# Altium PCB OFP_CIM_v1.5.PcbDoc (part 1 of 3)
Units mil, origin at the board's own origin, x right, y up, seen from the top; angles counter-clockwise.
Board outline 4311.02 x 2539.37 mil, 4 copper layers (Top Layer, Layer 1, Layer 2, Bottom Layer), stack 62.047 mil thick; 193 components, 140 nets, 567 pads, 380 vias.
Unrouted connection lines stored in the file: 1.
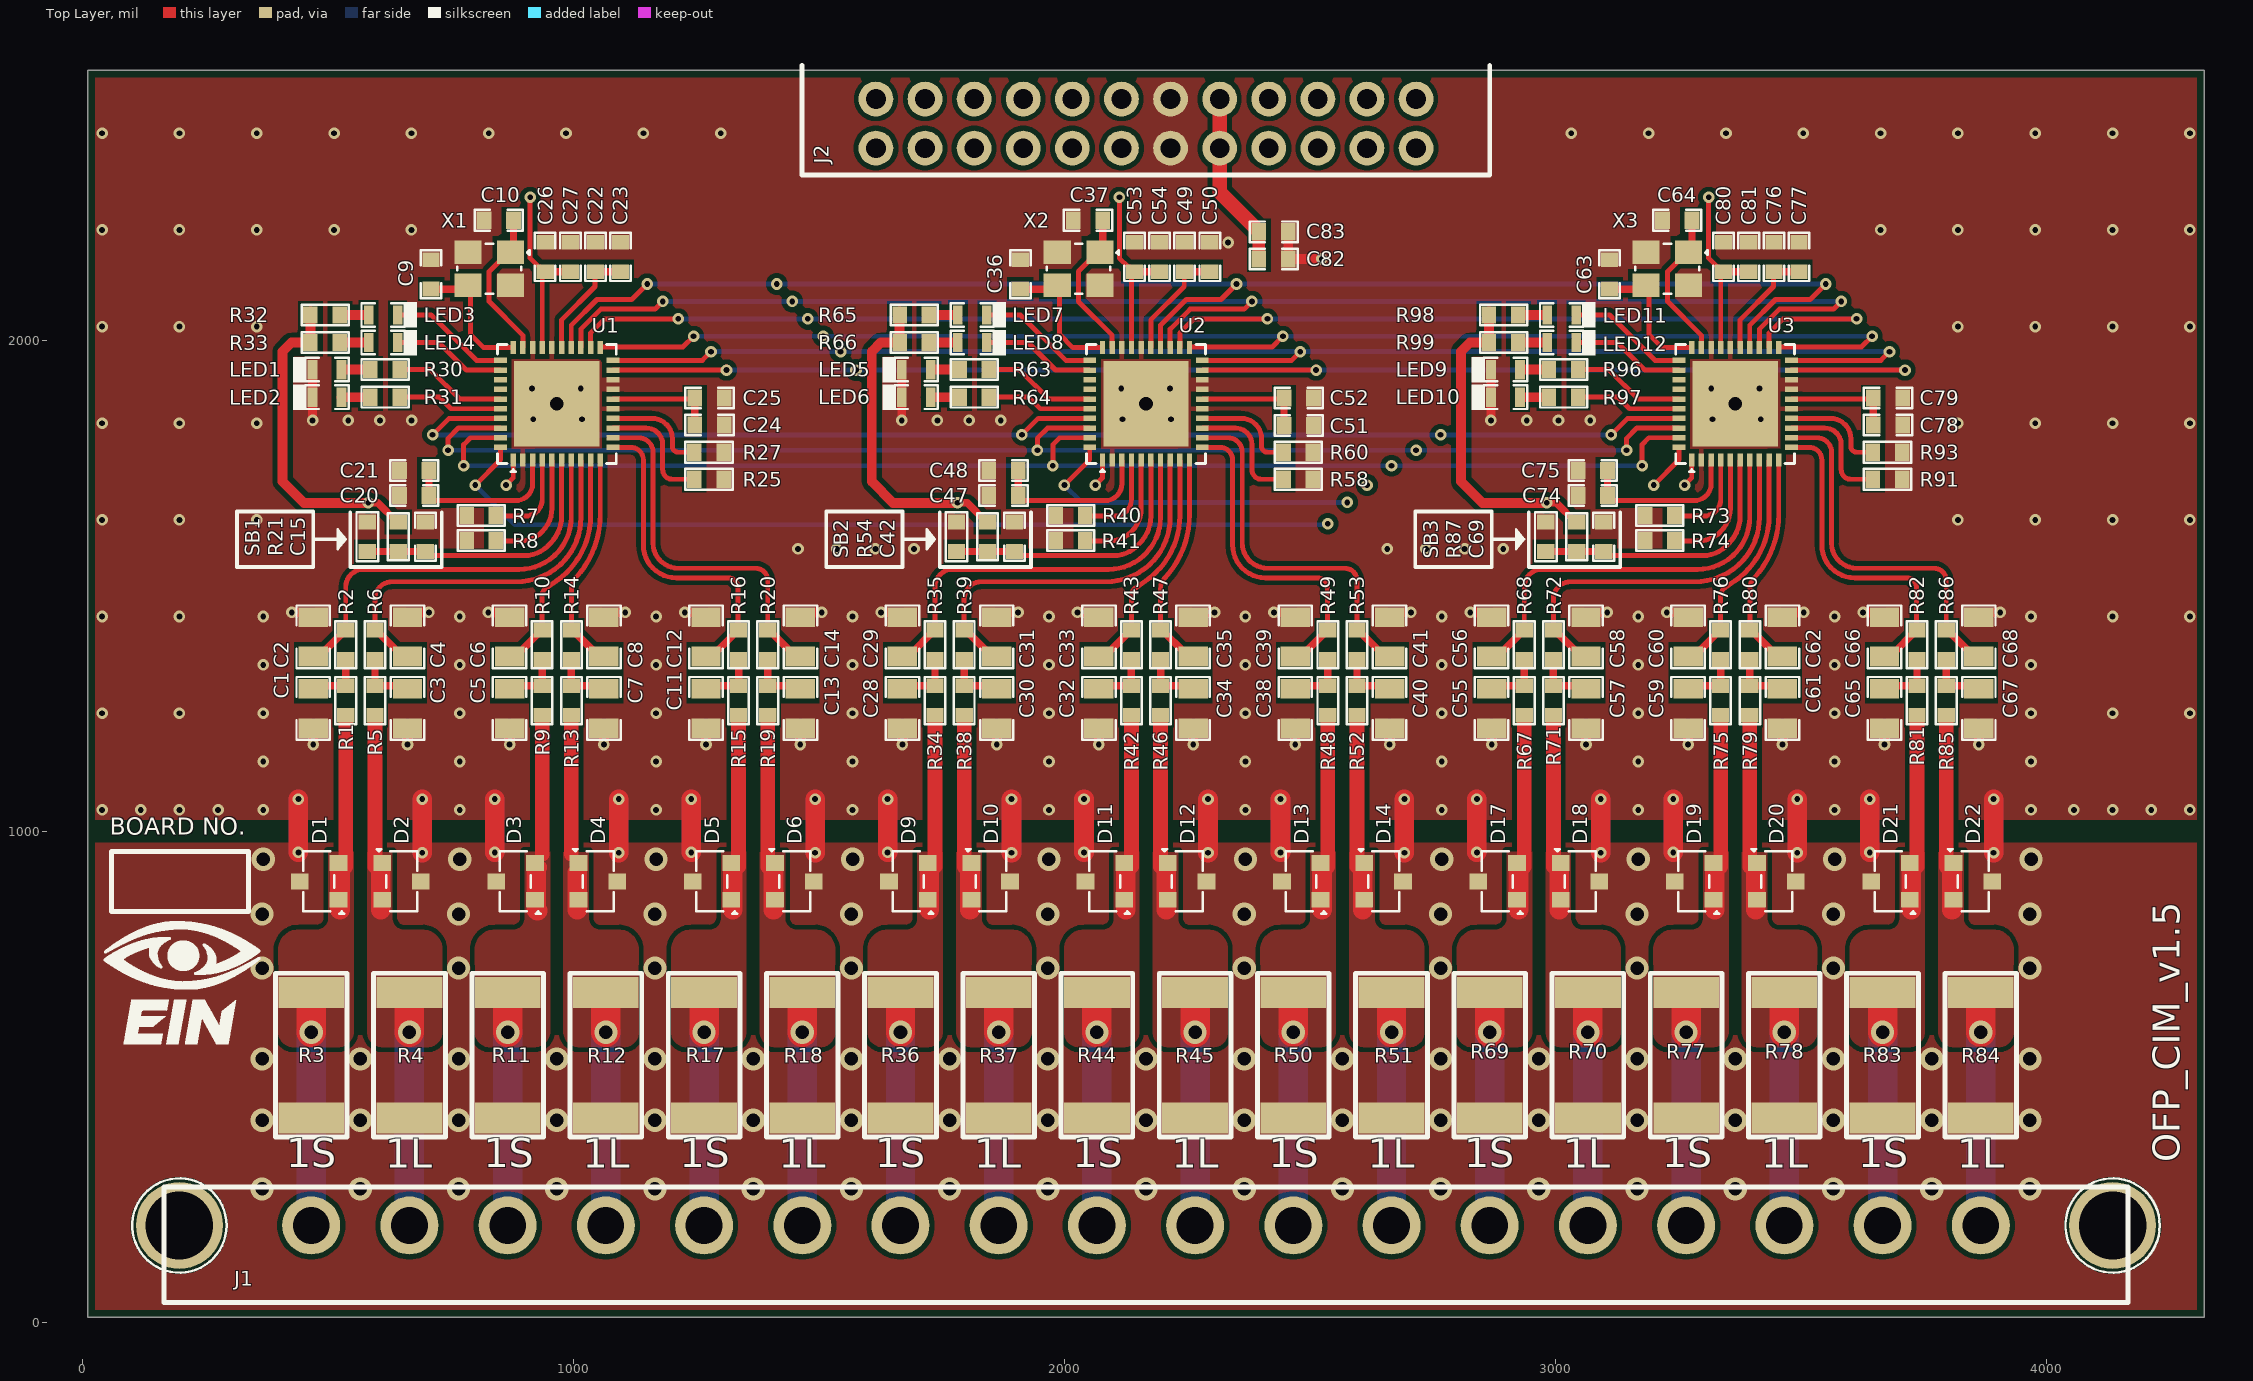
[diagram p0: Top Layer view]
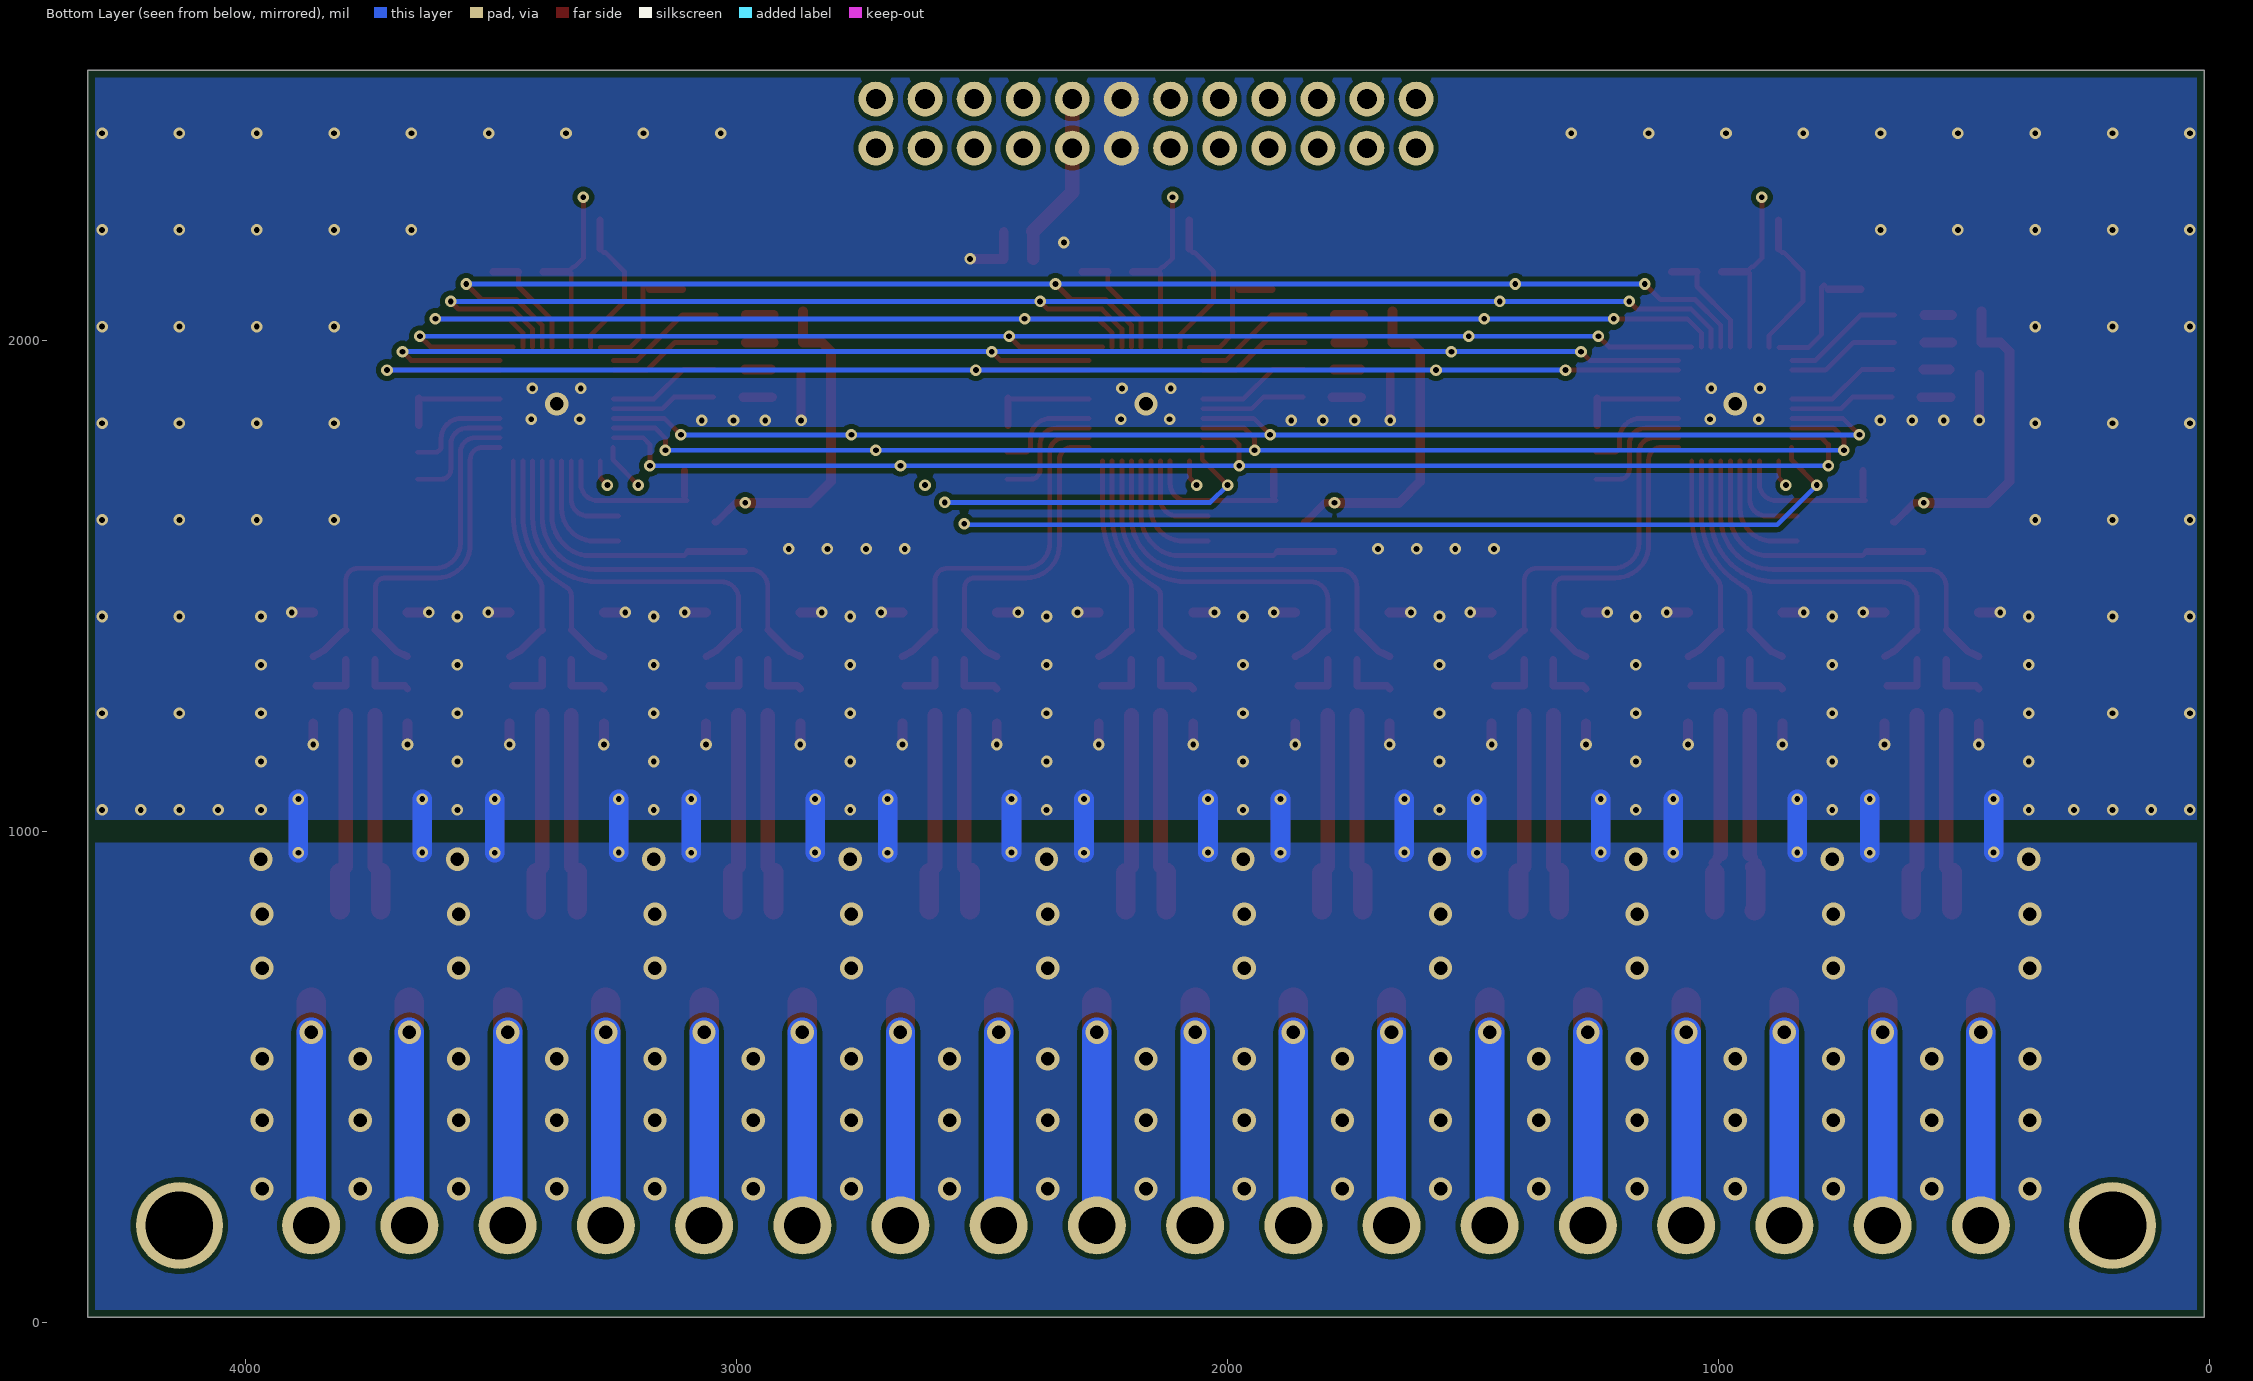
[diagram p1: Bottom Layer view, seen from below]
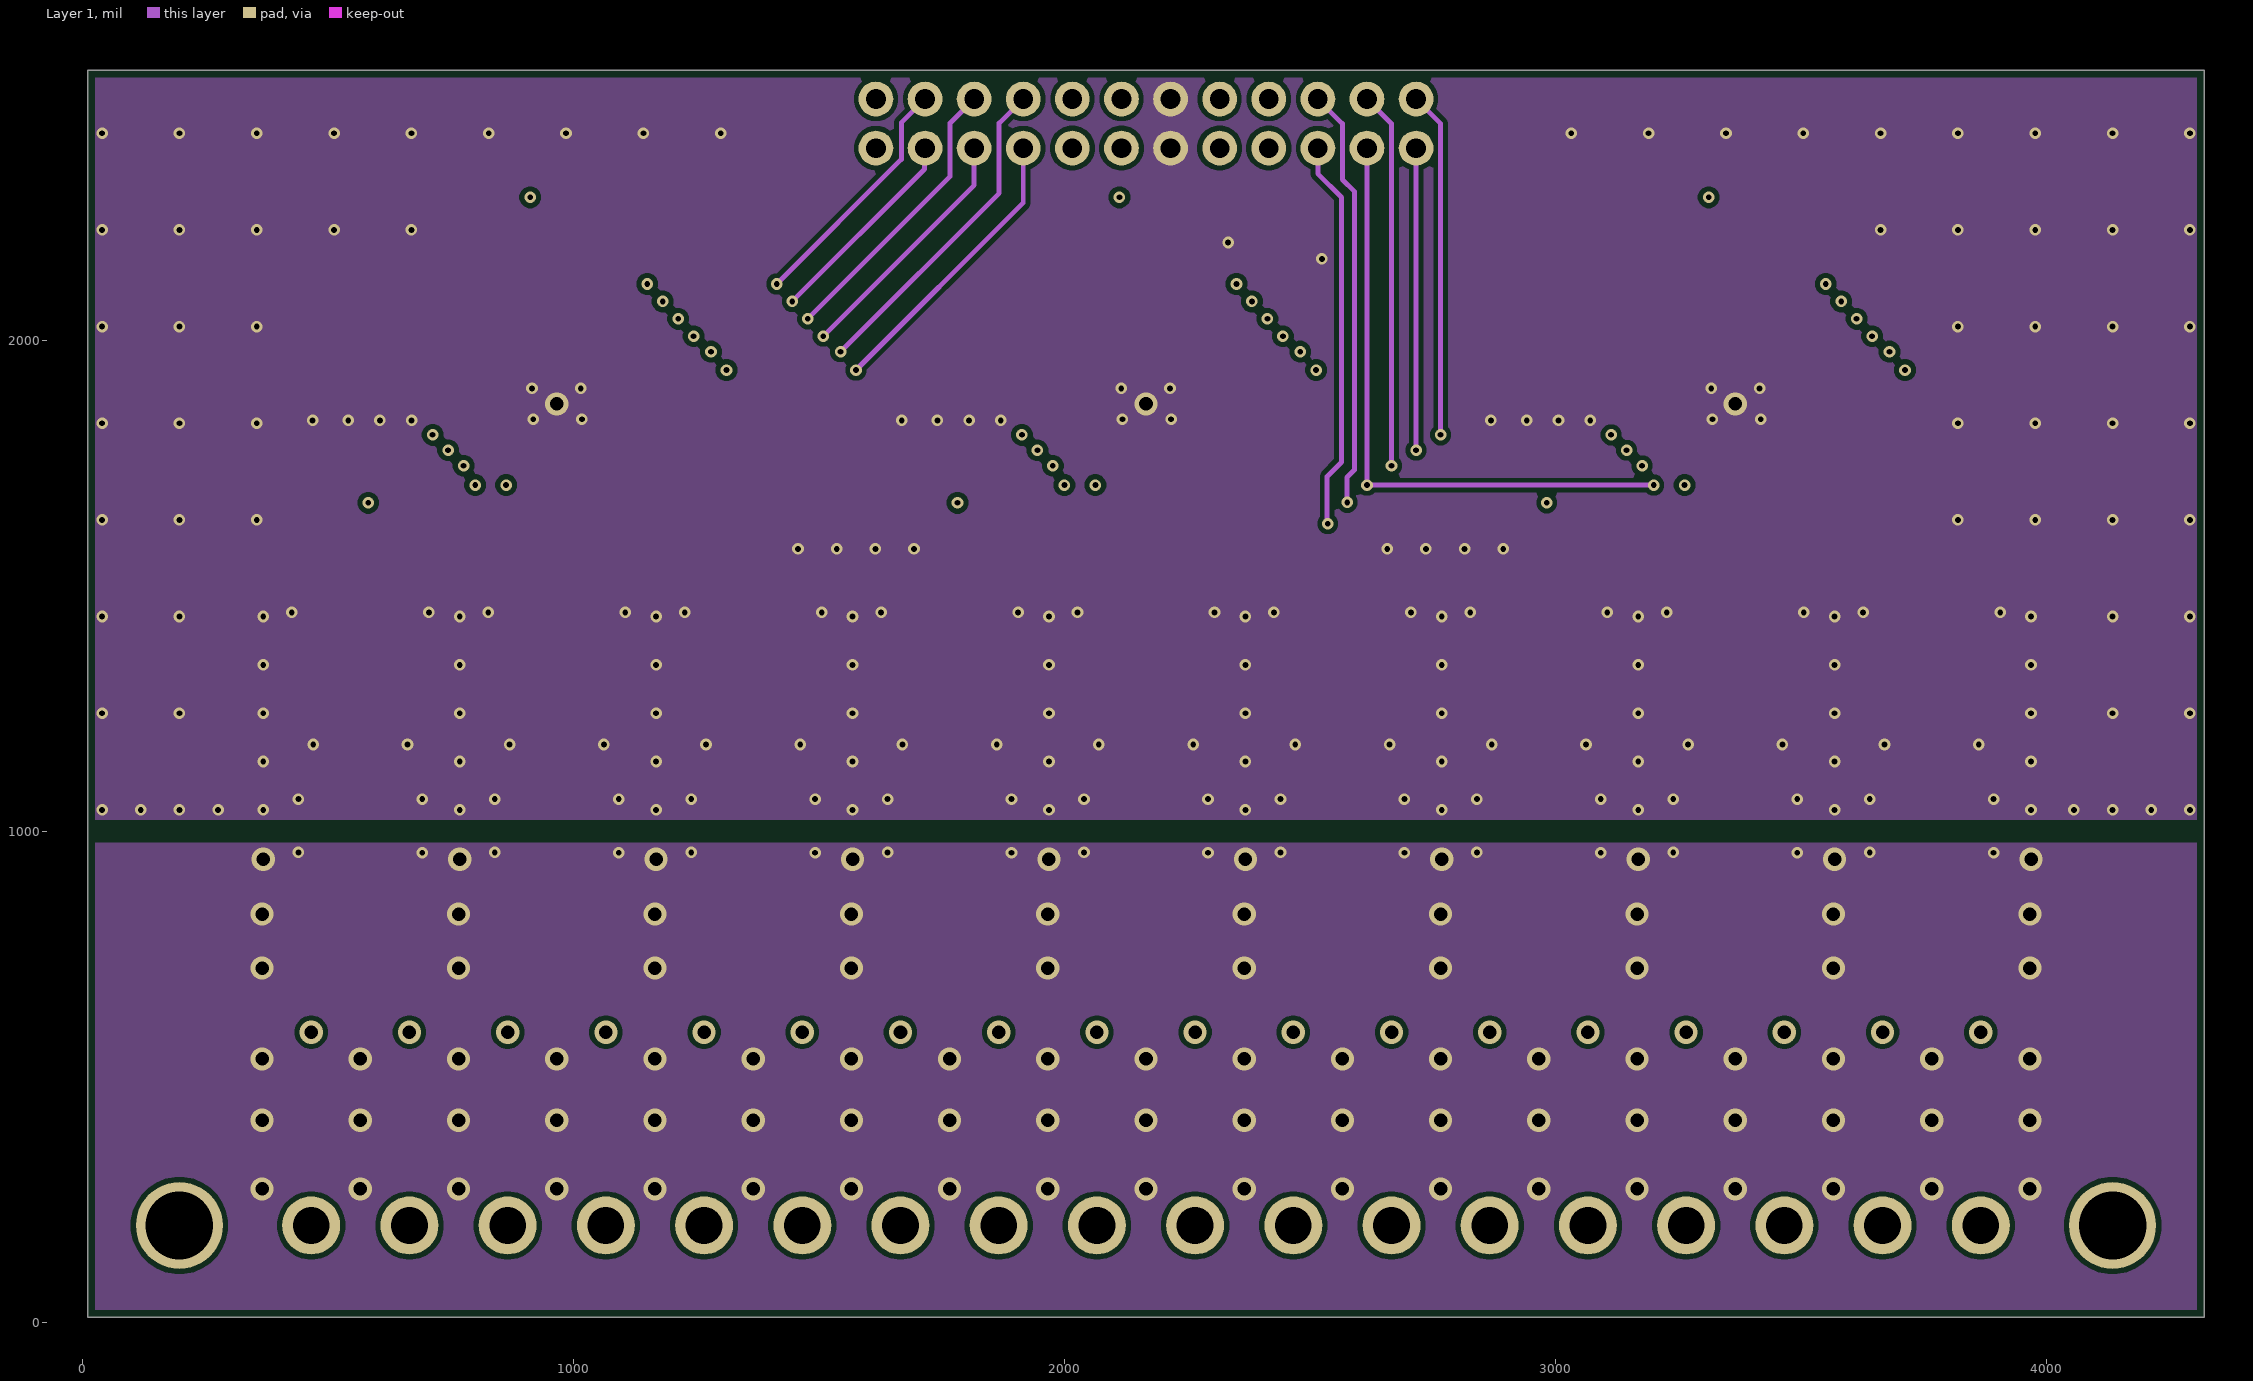
[diagram p2: Layer 1]
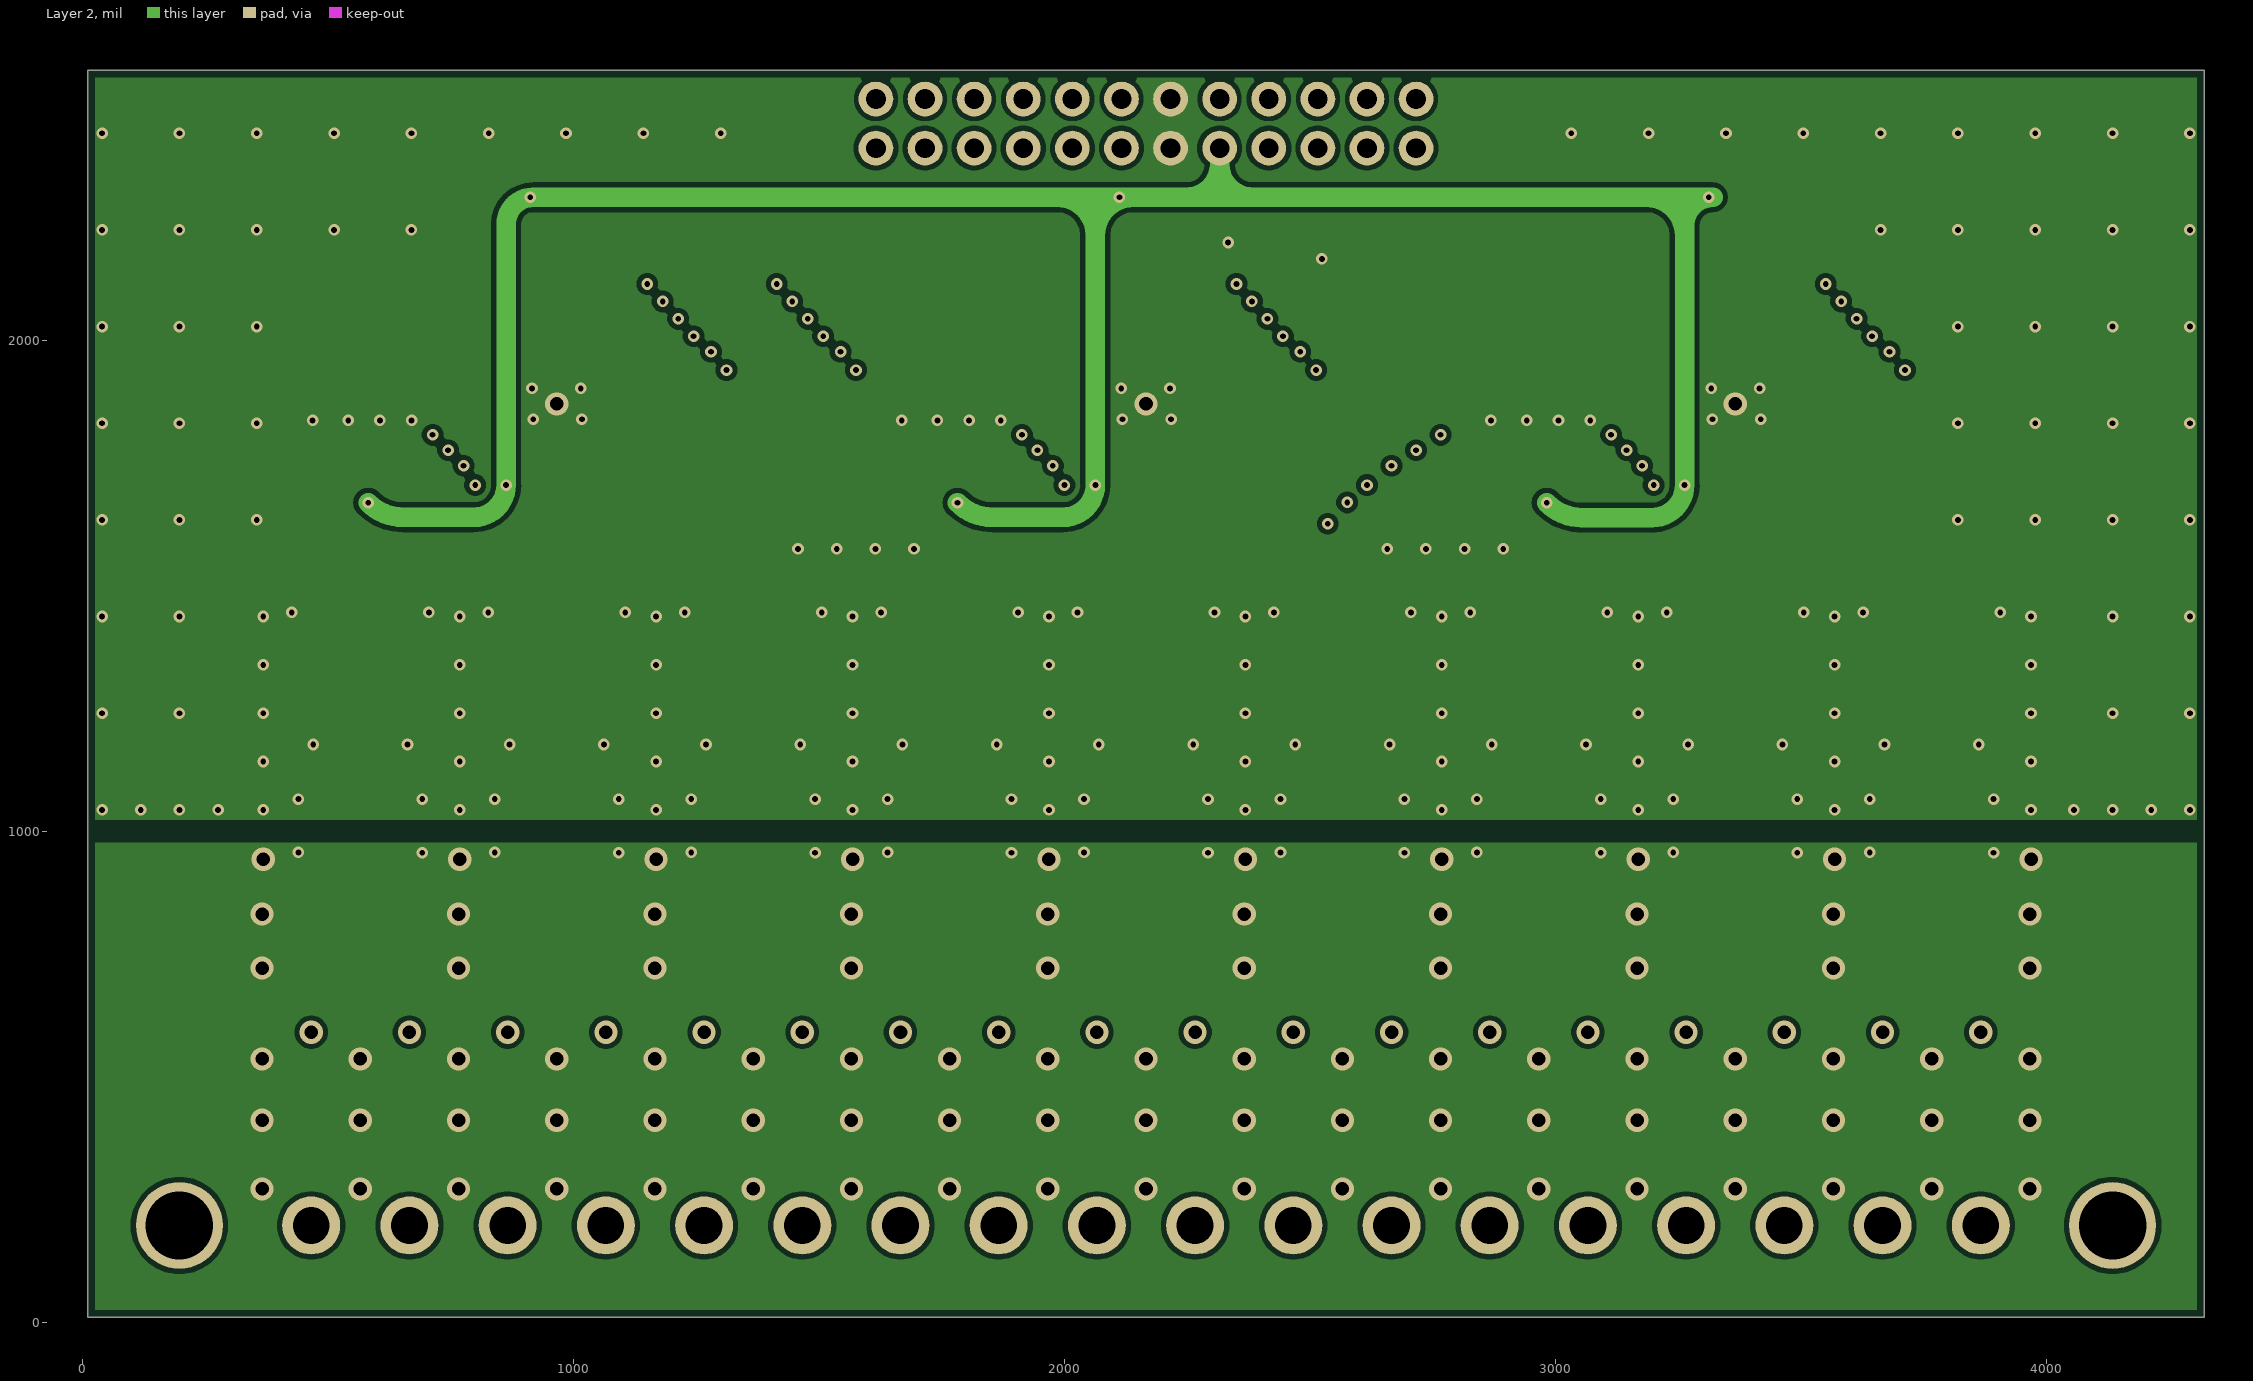
[diagram p3: Layer 2]
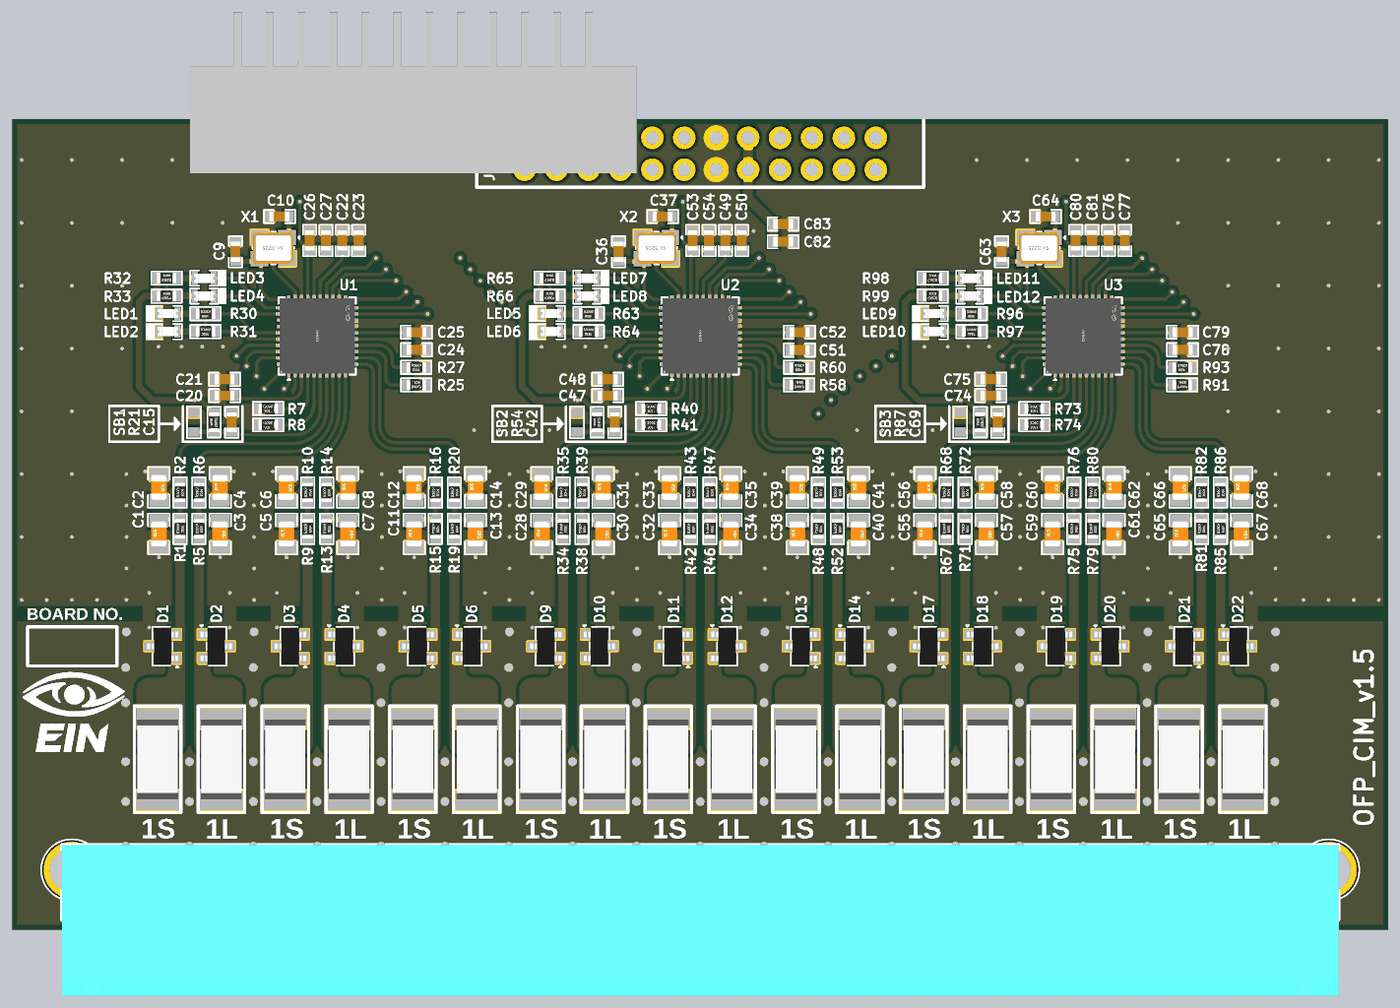
[diagram p5: 3D render of the assembled board from above, using the file's embedded part models]

## Layer stack, top to bottom
Top Solder: solder mask 0.4, Solder Resist, Dk 3.5
Top Layer: signal copper 1.378
Dielectric 2: prepreg 7.992, PP-006, Dk 4.1
Layer 1: signal copper 1.378
Dielectric 1: dielectric 40.551, FR-4, Dk 4.8
Layer 2: signal copper 1.378
Dielectric 3: prepreg 7.992, PP-006, Dk 4.1
Bottom Layer: signal copper 1.378
Bottom Solder: solder mask 0.4, Solder Resist, Dk 3.5

## Board outline
9.84,9.84 9.84,2549.21 4320.87,2549.21 4320.87,9.84

## Design rules (kind name [scope] priority, off if disabled: settings)
BoardOutlineClearance [All] p1: gap=0 ignorepadtopadclearanceinfootprint=FALSE except(15: Poly-OutlineEdge)
Clearance [All] p1: gap=10 ignorepadtopadclearanceinfootprint=FALSE except(7: Arc-Arc Arc-Track Arc-SMDPad Arc-THPad Track-Track Track-SMDPad Track-THPad SMDPad-SMDPad)
ComponentClearance [All] p1: gap=0 collisioncheckmode=3 verticalgap=0 showdistances=FALSE
HoleSize [All] p1: absolutevalues=TRUE maxlimit=1000 minlimit=1 maxpercent=80.000 minpercent=20.000
HoleToHoleClearance [All] p1: gap=0 allowstackedmicrovias=TRUE
MinimumSolderMaskSliver [All] p1: minsoldermaskwidth=0
PolygonConnect [All] p1: connectstyle=Direct reliefconductorwidth=10 reliefentries=4 polygonreliefangle="90 Angle" airgapwidth=10
RoutingVias [All] p1: holewidth=11.81 width=23.62 viastyle="Through Hole" minholewidth=11.81 minwidth=23.62 maxholewidth=27.56 maxwidth=47.24
SilkToSilkClearance [All] p1: silktosilkclearance=0
SilkToSolderMaskClearance [IsPad] p1: minsilkscreentomaskgap=0 clearancetoexposedcopper=TRUE
SolderMaskExpansion [All] p1: expansion=4 istentingtop=FALSE
SupplyNets "Schematic Supply Nets_40" [InNet('INN1')] p1: voltage=0.000
SupplyNets "Schematic Supply Nets_39" [InNet('IBP2')] p2: voltage=0.000
SupplyNets "Schematic Supply Nets_38" [InNet('DVDD3')] p3: voltage=0.000
SupplyNets "Schematic Supply Nets_37" [InNet('AVDD3')] p4: voltage=0.000
SupplyNets "Schematic Supply Nets_36" [InNet('AVDD2')] p5: voltage=0.000
SupplyNets "Schematic Supply Nets_35" [InNet('AVDD1')] p6: voltage=0.000
SupplyNets "Schematic Supply Nets_34" [InNet('INN3')] p7: voltage=0.000
SupplyNets "Schematic Supply Nets_33" [InNet('VA_P')] p8: voltage=0.000
SupplyNets "Schematic Supply Nets_32" [InNet('INP2')] p9: voltage=0.000
SupplyNets "Schematic Supply Nets_31" [InNet('IBP3')] p10: voltage=0.000
SupplyNets "Schematic Supply Nets_30" [InNet('IAN2')] p11: voltage=0.000
SupplyNets "Schematic Supply Nets_29" [InNet('VB_P')] p12: voltage=0.000
SupplyNets "Schematic Supply Nets_28" [InNet('REF1')] p13: voltage=0.000
SupplyNets "Schematic Supply Nets_27" [InNet('REF3')] p14: voltage=0.000
SupplyNets "Schematic Supply Nets_26" [InNet('ICP2')] p15: voltage=0.000
SupplyNets "Schematic Supply Nets_25" [InNet('IBN2')] p16: voltage=0.000
SupplyNets "Schematic Supply Nets_24" [InNet('VB_N')] p17: voltage=0.000
SupplyNets "Schematic Supply Nets_23" [InNet('VC_N')] p18: voltage=0.000
SupplyNets "Schematic Supply Nets_22" [InNet('DVDD2')] p19: voltage=0.000
SupplyNets "Schematic Supply Nets_21" [InNet('IAP2')] p20: voltage=0.000
SupplyNets "Schematic Supply Nets_20" [InNet('IAN3')] p21: voltage=0.000
SupplyNets "Schematic Supply Nets_19" [InNet('VC_P')] p22: voltage=0.000
SupplyNets "Schematic Supply Nets_18" [InNet('IBP1')] p23: voltage=0.000
SupplyNets "Schematic Supply Nets_17" [InNet('IBN3')] p24: voltage=0.000
SupplyNets "Schematic Supply Nets_16" [InNet('INP3')] p25: voltage=0.000
SupplyNets "Schematic Supply Nets_15" [InNet('ICP1')] p26: voltage=0.000
SupplyNets "Schematic Supply Nets_14" [InNet('INP1')] p27: voltage=0.000
SupplyNets "Schematic Supply Nets_13" [InNet('IAP1')] p28: voltage=0.000
SupplyNets "Schematic Supply Nets_12" [InNet('REF2')] p29: voltage=0.000
SupplyNets "Schematic Supply Nets_11" [InNet('ICN1')] p30: voltage=0.000
SupplyNets "Schematic Supply Nets_10" [InNet('IAN1')] p31: voltage=0.000
SupplyNets "Schematic Supply Nets_9" [InNet('ICN2')] p32: voltage=0.000
SupplyNets "Schematic Supply Nets_8" [InNet('ICP3')] p33: voltage=0.000
SupplyNets "Schematic Supply Nets_7" [InNet('VA_N')] p34: voltage=0.000
SupplyNets "Schematic Supply Nets_6" [InNet('IAP3')] p35: voltage=0.000
SupplyNets "Schematic Supply Nets_5" [InNet('DVDD1')] p36: voltage=0.000
SupplyNets "Schematic Supply Nets_4" [InNet('NGND')] p37: voltage=0.000
SupplyNets "Schematic Supply Nets_3" [InNet('INN2')] p38: voltage=0.000
SupplyNets "Schematic Supply Nets_2" [InNet('IBN1')] p39: voltage=0.000
SupplyNets "Schematic Supply Nets_1" [InNet('+3V3')] p40: voltage=0.000
SupplyNets "Schematic Supply Nets" [InNet('ICN3')] p41: voltage=0.000
Width [All] p1: maxlimit=100 minlimit=8 preferedwidth=15 minimp=50.000000 maximp=50.000000 favimp=50.000000
24 further rules are at their usual default settings.

## Classes and differential pairs
component class Power-Processor-3-Sheet: C55 C56 C57 C58 C59 C60 C61 C62 C63 C64 C65 C66 C67 C68 C69 C74 C75 C76 C77 C78 C79 C80 C81 D17 D18 D19 D20 D21 D22 LED9 LED10 LED11 LED12 R67 R68 R69 R70 R71 R72 R73 R74 R75 R76 R77 R78 R79 R80 R81 R82 R83 R84 R85 R86 R87 R91 R93 R96 R97 R98 R99 SB3 U3 X3
component class Power-Processor-2-Sheet: C28 C29 C30 C31 C32 C33 C34 C35 C36 C37 C38 C39 C40 C41 C42 C47 C48 C49 C50 C51 C52 C53 C54 D9 D10 D11 D12 D13 D14 LED5 LED6 LED7 LED8 R34 R35 R36 R37 R38 R39 R40 R41 R42 R43 R44 R45 R46 R47 R48 R49 R50 R51 R52 R53 R54 R58 R60 R63 R64 R65 R66 SB2 U2 X2
component class Power-Processor-1-Sheet: C1 C2 C3 C4 C5 C6 C7 C8 C9 C10 C11 C12 C13 C14 C15 C20 C21 C22 C23 C24 C25 C26 C27 D1 D2 D3 D4 D5 D6 LED1 LED2 LED3 LED4 R1 R2 R3 R4 R5 R6 R7 R8 R9 R10 R11 R12 R13 R14 R15 R16 R17 R18 R19 R20 R21 R25 R27 R30 R31 R32 R33 SB1 U1 X1
component class Connectors-Sheet: C82 C83 J1 J2 J3 J4 J5

## Components (designator, comment, footprint, x,y, rotation, side; value= is the part's Value field where it differs from the comment)
C1 "22nF" Cap-0805 469.29,1249.84 r90 top
C2 "22nF" Cap-0805 469.29,1395.51 r270 top
C3 "22nF" Cap-0805 661.42,1249.84 r270 top
C4 "22nF" Cap-0805 661.42,1395.51 r90 top
C5 "22nF" Cap-0805 869.29,1249.84 r90 top
C6 "22nF" Cap-0805 869.29,1395.51 r270 top
C7 "22nF" Cap-0805 1061.42,1249.84 r270 top
C8 "22nF" Cap-0805 1061.42,1395.51 r90 top
C9 "15pF" Cap-0603 709.45,2133.86 r270 top locked
C10 "15pF" Cap-0603 847.24,2244.1 r0 top locked
C11 "22nF" Cap-0805 1269.29,1249.84 r90 top
C12 "22nF" Cap-0805 1269.29,1395.51 r270 top
C13 "22nF" Cap-0805 1461.42,1249.84 r270 top
C14 "22nF" Cap-0805 1461.42,1395.51 r90 top
C15 "0.1uF" Cap-0603 697.64,1599.55 r270 top locked value=100nF
C20 "0.1uF" Cap-0603 675.08,1683.23 r0 top locked value=100nF
C21 "4.7uF" Cap-0603 675.08,1734.41 r0 top locked
C22 "0.1uF" Cap-0603 1044.09,2169.29 r270 top locked value=100nF
C23 "4.7uF" Cap-0603 1095.28,2169.29 r270 top locked
C24 "0.1uF" Cap-0603 1276.38,1826.77 r180 top locked value=100nF
C25 "4.7uF" Cap-0603 1276.38,1881.89 r180 top locked
C26 "0.1uF" Cap-0603 941.73,2169.29 r270 top locked value=100nF
C27 "4.7uF" Cap-0603 992.91,2169.29 r270 top locked
C28 "22nF" Cap-0805 1669.29,1249.84 r90 top
C29 "22nF" Cap-0805 1669.29,1395.51 r270 top
C30 "22nF" Cap-0805 1861.42,1249.84 r270 top
C31 "22nF" Cap-0805 1861.42,1395.51 r90 top
C32 "22nF" Cap-0805 2069.29,1249.84 r90 top
C33 "22nF" Cap-0805 2069.29,1395.51 r270 top
C34 "22nF" Cap-0805 2261.42,1249.84 r270 top
C35 "22nF" Cap-0805 2261.42,1395.51 r90 top
C36 "15pF" Cap-0603 1909.45,2133.86 r270 top locked
C37 "15pF" Cap-0603 2047.24,2244.1 r0 top locked
C38 "22nF" Cap-0805 2469.29,1249.84 r90 top
C39 "22nF" Cap-0805 2469.29,1395.51 r270 top
C40 "22nF" Cap-0805 2661.42,1249.84 r270 top
C41 "22nF" Cap-0805 2661.42,1395.51 r90 top
C42 "0.1uF" Cap-0603 1897.64,1599.55 r270 top locked value=100nF
C47 "0.1uF" Cap-0603 1875.08,1683.23 r0 top locked value=100nF
C48 "4.7uF" Cap-0603 1875.08,1734.41 r0 top locked
C49 "0.1uF" Cap-0603 2244.09,2169.29 r270 top locked value=100nF
C50 "4.7uF" Cap-0603 2295.28,2169.29 r270 top locked
C51 "0.1uF" Cap-0603 2476.38,1825.77 r180 top locked value=100nF
C52 "4.7uF" Cap-0603 2476.38,1881.89 r180 top locked
C53 "0.1uF" Cap-0603 2141.73,2169.29 r270 top locked value=100nF
C54 "4.7uF" Cap-0603 2192.91,2169.29 r270 top locked
C55 "22nF" Cap-0805 2869.29,1249.84 r90 top
C56 "22nF" Cap-0805 2869.29,1395.51 r270 top
C57 "22nF" Cap-0805 3061.42,1249.84 r270 top
C58 "22nF" Cap-0805 3061.42,1395.51 r90 top
C59 "22nF" Cap-0805 3269.29,1249.84 r90 top
C60 "22nF" Cap-0805 3269.29,1395.52 r270 top
C61 "22nF" Cap-0805 3461.42,1249.84 r270 top
C62 "22nF" Cap-0805 3461.42,1395.51 r90 top
C63 "15pF" Cap-0603 3109.45,2133.86 r270 top locked
C64 "15pF" Cap-0603 3247.24,2244.1 r0 top locked
C65 "22nF" Cap-0805 3669.29,1249.84 r90 top
C66 "22nF" Cap-0805 3669.29,1395.51 r270 top
C67 "22nF" Cap-0805 3861.42,1249.84 r270 top
C68 "22nF" Cap-0805 3861.42,1395.51 r90 top
C69 "0.1uF" Cap-0603 3097.64,1599.55 r270 top locked value=100nF
C74 "0.1uF" Cap-0603 3075.08,1683.23 r0 top locked value=100nF
C75 "4.7uF" Cap-0603 3075.08,1734.41 r0 top locked
C76 "0.1uF" Cap-0603 3444.09,2169.29 r270 top locked value=100nF
C77 "4.7uF" Cap-0603 3495.28,2169.29 r270 top locked
C78 "0.1uF" Cap-0603 3676.38,1826.77 r180 top locked value=100nF
C79 "4.7uF" Cap-0603 3676.38,1881.89 r180 top locked
C80 "0.1uF" Cap-0603 3341.73,2169.29 r270 top locked value=100nF
C81 "4.7uF" Cap-0603 3392.91,2169.29 r270 top locked
C82 "0.1uF" Cap-0603 2425.2,2165.35 r180 top locked value=100nF
C83 "4.7uF" Cap-0603 2425.2,2220.47 r180 top locked
D1 "BAV99,215" SOT-23 481.5,897.56 r90 top locked value=1.5pF
D2 "BAV99,215" SOT-23 649.21,897.56 r270 top locked value=1.5pF
D3 "BAV99,215" SOT-23 881.5,897.56 r90 top locked value=1.5pF
D4 "BAV99,215" SOT-23 1049.21,897.56 r270 top locked value=1.5pF
D5 "BAV99,215" SOT-23 1281.5,897.56 r90 top locked value=1.5pF
D6 "BAV99,215" SOT-23 1449.21,897.56 r270 top locked value=1.5pF
D9 "BAV99,215" SOT-23 1681.5,897.56 r90 top locked value=1.5pF
D10 "BAV99,215" SOT-23 1849.21,897.56 r270 top locked value=1.5pF
D11 "BAV99,215" SOT-23 2081.5,897.56 r90 top locked value=1.5pF
D12 "BAV99,215" SOT-23 2249.21,897.56 r270 top locked value=1.5pF
D13 "BAV99,215" SOT-23 2481.5,897.56 r90 top locked value=1.5pF
D14 "BAV99,215" SOT-23 2649.21,897.56 r270 top locked value=1.5pF
D17 "BAV99,215" SOT-23 2881.5,897.56 r90 top locked value=1.5pF
D18 "BAV99,215" SOT-23 3049.21,897.56 r270 top locked value=1.5pF
D19 "BAV99,215" SOT-23 3281.5,897.56 r90 top locked value=1.5pF
D20 "BAV99,215" SOT-23 3449.21,897.56 r270 top locked value=1.5pF
D21 "BAV99,215" SOT-23 3681.5,897.56 r90 top locked value=1.5pF
D22 "BAV99,215" SOT-23 3849.21,897.56 r270 top locked value=1.5pF
J1 "DB2ERM-5.08-18P-GN" DB2ERM-5.08-18P-GN 2165.35,196.85 r0 top locked
J2 "SFH11-PBPC-D12-RA-BK" SFH11-PBPC-D12-RA-BK 2165.35,2440.95 r180 top locked
LED1 "Emerald" LED-0603 497.6,1939.88 r180 top
LED2 "Emerald" LED-0603 497.6,1883.7 r180 top
LED3 "Emerald" LED-0603 611.71,2051.18 r0 top locked
LED4 "Emerald" LED-0603 611.71,1995 r0 top locked
LED5 "Emerald" LED-0603 1697.6,1939.88 r180 top locked
LED6 "Emerald" LED-0603 1697.6,1883.7 r180 top locked
LED7 "Emerald" LED-0603 1811.71,2051.18 r0 top locked
LED8 "Emerald" LED-0603 1811.71,1995 r0 top locked
LED9 "Emerald" LED-0603 2897.6,1939.88 r180 top locked
LED10 "Emerald" LED-0603 2897.6,1883.7 r180 top locked
LED11 "Emerald" LED-0603 3011.71,2051.18 r0 top locked
LED12 "Emerald" LED-0603 3011.71,1995 r0 top locked
R1 "0R" Res-0603 535.63,1265.84 r90 top
R2 "1K" Res-0603 535.63,1379.51 r90 top
R3 "2mR" RES-2512 465.35,543.82 r90 top locked
R4 "2mR" RES-2512 665.35,543.61 r270 top locked
R5 "0R" Res-0603 595.08,1265.84 r90 top
R6 "1K" Res-0603 595.08,1379.51 r90 top
R7 "0R" Res-0603 811.81,1642.73 r0 top
R8 "0R" Res-0603 811.81,1591.55 r0 top
R9 "0R" Res-0603 935.63,1265.84 r90 top
R10 "1K" Res-0603 935.63,1379.51 r90 top
R11 "2mR" RES-2512 865.35,543.82 r90 top locked
R12 "2mR" RES-2512 1065.35,543.61 r270 top locked
R13 "0R" Res-0603 995.08,1265.84 r90 top
R14 "1K" Res-0603 995.08,1379.51 r90 top
R15 "0R" Res-0603 1335.63,1265.84 r90 top
R16 "1K" Res-0603 1335.63,1379.51 r90 top
R17 "2mR" RES-2512 1265.35,543.82 r90 top locked
R18 "2mR" RES-2512 1465.35,543.61 r270 top locked
R19 "0R" Res-0603 1395.08,1265.84 r90 top
R20 "1K" Res-0603 1395.08,1379.51 r90 top
R21 "10K" Res-0603 642.52,1599.55 r270 top locked
R25 "0R" Res-0603 1275.38,1716.54 r180 top locked
R27 "0R" Res-0603 1275.38,1771.65 r0 top locked
R30 "680R" Res-0603 615.71,1939.88 r0 top
R31 "680R" Res-0603 615.71,1883.7 r0 top
R32 "680R" Res-0603 493.6,2051.18 r180 top locked
R33 "680R" Res-0603 493.6,1995 r180 top locked
R34 "0R" Res-0603 1735.63,1265.84 r90 top
R35 "1K" Res-0603 1735.63,1379.51 r90 top
R36 "2mR" RES-2512 1665.35,543.82 r90 top locked
R37 "2mR" RES-2512 1865.35,543.61 r270 top locked
R38 "0R" Res-0603 1795.08,1265.84 r90 top
R39 "1K" Res-0603 1795.08,1379.51 r90 top
R40 "0R" Res-0603 2011.81,1642.73 r0 top
R41 "0R" Res-0603 2011.81,1591.55 r0 top
R42 "0R" Res-0603 2135.63,1265.84 r90 top
R43 "1K" Res-0603 2135.63,1379.51 r90 top
R44 "2mR" RES-2512 2065.35,543.82 r90 top locked
R45 "2mR" RES-2512 2265.35,543.61 r270 top locked
R46 "0R" Res-0603 2195.08,1265.84 r90 top
R47 "1K" Res-0603 2195.08,1379.51 r90 top
R48 "0R" Res-0603 2535.63,1265.84 r90 top
R49 "1K" Res-0603 2535.63,1379.51 r90 top
R50 "2mR" RES-2512 2465.35,543.82 r90 top locked
R51 "2mR" RES-2512 2665.35,543.61 r270 top locked
R52 "0R" Res-0603 2595.08,1265.84 r90 top
R53 "1K" Res-0603 2595.08,1379.51 r90 top
R54 "10K" Res-0603 1842.52,1599.55 r270 top locked
R58 "0R" Res-0603 2475.38,1716.54 r180 top locked
R60 "0R" Res-0603 2475.38,1771.65 r0 top locked
R63 "680R" Res-0603 1815.71,1939.88 r0 top locked
R64 "680R" Res-0603 1815.71,1883.7 r0 top locked
R65 "680R" Res-0603 1693.6,2051.18 r180 top locked
R66 "680R" Res-0603 1693.6,1995 r180 top locked
R67 "0R" Res-0603 2935.63,1265.84 r90 top
R68 "1K" Res-0603 2935.63,1379.51 r90 top
R69 "2mR" RES-2512 2865.35,543.82 r90 top locked
R70 "2mR" RES-2512 3065.35,543.61 r270 top locked
R71 "0R" Res-0603 2995.08,1265.84 r90 top
R72 "1K" Res-0603 2995.08,1379.51 r90 top
R73 "0R" Res-0603 3211.81,1642.73 r0 top
R74 "0R" Res-0603 3211.81,1591.55 r0 top
R75 "0R" Res-0603 3335.63,1265.84 r90 top
R76 "1K" Res-0603 3335.63,1379.51 r90 top
R77 "2mR" RES-2512 3265.35,543.82 r90 top locked
R78 "2mR" RES-2512 3465.35,543.61 r270 top locked
R79 "0R" Res-0603 3395.08,1265.84 r90 top
R80 "1K" Res-0603 3395.08,1379.51 r90 top
R81 "0R" Res-0603 3735.63,1265.84 r90 top
R82 "1K" Res-0603 3735.63,1379.51 r90 top
R83 "2mR" RES-2512 3665.35,543.82 r90 top locked
R84 "2mR" RES-2512 3865.35,543.61 r270 top locked
R85 "0R" Res-0603 3795.08,1265.84 r90 top
R86 "1K" Res-0603 3795.08,1379.51 r90 top
R87 "10K" Res-0603 3042.52,1599.55 r270 top locked
R91 "0R" Res-0603 3675.38,1716.54 r180 top locked
R93 "0R" Res-0603 3675.38,1771.65 r0 top locked
R96 "680R" Res-0603 3015.71,1939.88 r0 top locked
R97 "680R" Res-0603 3015.71,1883.7 r0 top locked
R98 "680R" Res-0603 2893.6,2051.18 r180 top locked
R99 "680R" Res-0603 2893.6,1995 r180 top locked
SB1 "Solder Bridge 0603" "Solder Bridge" 579.53,1599.55 r270 top locked
SB2 "Solder Bridge 0603" "Solder Bridge" 1779.53,1599.55 r270 top locked
SB3 "Solder Bridge 0603" "Solder Bridge" 2979.53,1599.55 r270 top locked
U1 "ADE9000ACPZ" "40-LFCSP-WQ (6x6)" 965.35,1870.08 r90 top locked
U2 "ADE9000ACPZ" "40-LFCSP-WQ (6x6)" 2165.35,1870.08 r90 top locked
U3 "ADE9000ACPZ" "40-LFCSP-WQ (6x6)" 3365.35,1870.08 r90 top locked
X1 "24.576MHz" SMD3225-4P 827.95,2145.28 r180 top locked
X2 "24.576MHz" SMD3225-4P 2027.95,2145.28 r180 top locked
X3 "24.576MHz" SMD3225-4P 3227.17,2145.28 r180 top locked

## Footprints (in the part's own frame and the unit in brackets; to place one, negate y for a bottom-side part, rotate by r counter-clockwise, add the part's x,y. Pads: shape width x height; smd on the part's side, far side on the other; paste and mask are expansions set on the pad)
"40-LFCSP-WQ (6x6)" [mm]
  rect 0.665x0.28 smd paste-100 mask+0.051: 1(-2.908,2.25) 2(-2.908,1.75) 3(-2.908,1.25) 4(-2.908,0.75) 5(-2.908,0.25) 6(-2.908,-0.25) 7(-2.908,-0.75) 8(-2.908,-1.25) 9(-2.908,-1.75) 10(-2.908,-2.25) 21(2.908,-2.25) 22(2.908,-1.75) 23(2.908,-1.25) 24(2.908,-0.75) 25(2.908,-0.25) 26(2.908,0.25) 27(2.908,0.75) 28(2.908,1.25) 29(2.908,1.75) 30(2.908,2.25)
  rect 0.28x0.665 smd paste-100 mask+0.051: 11(-2.25,-2.908) 12(-1.75,-2.908) 13(-1.25,-2.908) 14(-0.75,-2.908) 15(-0.25,-2.908) 16(0.25,-2.908) 17(0.75,-2.908) 18(1.25,-2.908) 19(1.75,-2.908) 20(2.25,-2.908) 31(2.25,2.908) 32(1.75,2.908) 33(1.25,2.908) 34(0.75,2.908) 35(0.25,2.908) 36(-0.25,2.908) 37(-0.75,2.908) 38(-1.25,2.908) 39(-1.75,2.908) 40(-2.25,2.908)
  rect 4.42x4.42 smd paste-100 mask+0.051: 41(0,0)
  silkscreen extent -3.52,-3.08 3.08,3.08, body extent -3.01,-3.01 3.01,3.01, height 0.82
Cap-0603 [mil]
  rect 30x35 smd mask+2.36: 1(-30,0) 2(30,0)
  silkscreen extent -49,-21 49,21, body extent -32,-16 31,16, height 34
Cap-0805 [mil] "SMD 0805"
  rect 40x60 smd mask+2.76: 1(-40,0) 2(40,0)
  silkscreen extent -64,-34 64,34, body extent -39,-25 39,25, height 30
DB2ERM-5.08-18P-GN [mm]
  round 3 hole 1.9: 1(-43.18,0) 2(-38.1,0) 3(-33.02,0) 4(-27.94,0) 5(-22.86,0) 6(-17.78,0) 7(-12.7,0) 8(-7.62,0) 9(-2.54,0) 10(2.54,0) 11(7.62,0) 12(12.7,0) 13(17.78,0) 14(22.86,0) 15(27.94,0) 16(33.02,0) 17(38.1,0) 18(43.18,0)
  silkscreen extent -50.8,-3.98 50.8,2, body extent -50.8,-10 50.8,2, height 8.5
LED-0603 [mm]
  rect 0.5x1 smd: 1(-0.75,0) 2(0.75,0)
  silkscreen extent -1.12,-0.66 1.75,0.66, body extent -0.82,-0.37 0.82,0.36, height 0.68
Res-0603 [mil]
  rect 30x35 smd: 1(-30,0) 2(30,0)
  silkscreen extent -48,-21 48,21, body extent -31,-17 31,17, height 18
RES-2512 [mm]
  rect 1.6x3.4 smd: 1(-3.25,0) 2(3.25,0)
  silkscreen extent -4.24,-1.85 4.24,1.85, body extent -3.17,-1.63 3.18,1.63, height 0.58
SFH11-PBPC-D12-RA-BK [mm]
  round 1.8 hole 1.02: 1(-13.97,-1.27) 2(-13.97,1.27) 3(-11.43,-1.27) 4(-11.43,1.27) 5(-8.89,-1.27) 6(-8.89,1.27) 7(-6.35,-1.27) 8(-6.35,1.27) 9(-3.81,-1.27) 10(-3.81,1.27) 11(-1.27,-1.27) 12(-1.27,1.27) 13(1.27,-1.27) 14(1.27,1.27) 15(3.81,-1.27) 16(3.81,1.27) 17(6.35,-1.27) 18(6.35,1.27) 19(8.89,-1.27) 20(8.89,1.27) 21(11.43,-1.27) 22(11.43,1.27) 23(13.97,-1.27) 24(13.97,1.27)
  body extent -17.78,-11.29 17.78,1.55, height 7.05
SMD3225-4P [mm]
  rect 1.4x1.2 smd: 1(-1.1,-0.85) 2(1.1,-0.85) 3(1.1,0.85) 4(-1.1,0.85)
  silkscreen extent -2.08,-1.3 1.65,1.3, body extent -1.6,-1.25 1.6,1.25, height 0.81
"Solder Bridge" [mil] "Solder Bridge ON"
  rect 30x35 smd: 1(-30,0) 2(30,0)
  silkscreen extent -50,-22 50,22
SOT-23 [mm] "TRANS NPN 40V 0.6A SOT23"
  rect 0.82x0.92 smd: 1(-0.95,-1) 2(0.95,-1) 3(0,1)
  silkscreen extent -1.68,-1.3 1.55,0.81, body extent -1.5,-1.25 1.5,1.25, height 1.05

## Part data
C1 C2 C3 C4 C5 C6 C7 C8 C11 C12 C13 C14 C28 C29 C30 C31 C32 C33 C34 C35 C38 C39 C40 C41 C55 C56 C57 C58 C59 C60 C61 C62 C65 C66 C67 C68: library part GRM21B5C1H223JA01L, "CAP CER 0.022UF 50V C0G/NP0 0805", LCSC Part Number=C77069, Manufacturer=Murata, ComponentLink1Description=https://datasheet.ciiva.com/29042/1858738-29042965.pdf?src-supplier=Jameco, ComponentLink1URL=https://datasheet.ciiva.com/29042/1858738-29042965.pdf?src-supplier=Jameco, ComponentLink2Description=https://datasheet.ciiva.com/2989/product-2989681.pdf?src-supplier=Avnet, ComponentLink2URL=https://datasheet.ciiva.com/2989/product-2989681.pdf?src-supplier=Avnet, ComponentLink3Description=https://datasheet.ciiva.com/3777/99grm21b5c1h223ja0123-3777023.pdf?src-supplier=Arrow+Electronics, ComponentLink3URL=https://datasheet.ciiva.com/3777/99grm21b5c1h223ja0123-3777023.pdf?src-supplier=Arrow+Electronics, ComponentLink4Description=https://datasheet.ciiva.com/29200/453051-da-01-en-vs-kondensator-0805-29200670.pdf?src-supplier=Conrad, ComponentLink4URL=https://datasheet.ciiva.com/29200/453051-da-01-en-vs-kondensator-0805-29200670.pdf?src-supplier=Conrad, ComponentLink5Description=https://datasheet.ciiva.com/138/partnumbering-e-01-138787.pdf?src-supplier=Digikey, ComponentLink5URL=https://datasheet.ciiva.com/138/partnumbering-e-01-138787.pdf?src-supplier=Digikey, ComponentLink6Description=https://datasheet.ciiva.com/138/partnumbering-e-01-138788.pdf?src-supplier=Digikey, ComponentLink6URL=https://datasheet.ciiva.com/138/partnumbering-e-01-138788.pdf?src-supplier=Digikey, ComponentLink7Description=https://datasheet.ciiva.com/138/partnumbering-e-01-138789.pdf?src-supplier=Digikey, ComponentLink7URL=https://datasheet.ciiva.com/138/partnumbering-e-01-138789.pdf?src-supplier=Digikey, ComponentLink8Description=https://datasheet.ciiva.com/22703/608985-22703464.pdf?src-supplier=Element14, ComponentLink8URL=https://datasheet.ciiva.com/22703/608985-22703464.pdf?src-supplier=Element14, ComponentLink9Description=https://datasheet.ciiva.com/7828/608985-7828990.pdf?src-supplier=Element14, ComponentLink9URL=https://datasheet.ciiva.com/7828/608985-7828990.pdf?src-supplier=Element14, Item Type=Capacitors, Lead Free=5697LeadFree, Manufacturer Part Number=GRM21B5C1H223JA01L, Pricing="1=0.38, 10=0.162, 50=0.162, 100=0.108, 1000=0.089, 10000=0.065 (USD)", RoHS=Yes, Stock=33939, Supplier=Mouser
C9 C10 C36 C37 C63 C64: library part CC0603JRNPO9BN150, "CAP CER 15PF 50V C0G/NPO 0603", Case Code (Imperial)=0603, Case Code (Metric)=1608, Dielectric=C0G, Dielectric Material=Ceramic, Insulation Resistance=100GR, LCSC Part Number=C107037, Manufacturer=Yageo, Max Operating Temperature=125°C, Min Operating Temperature=-55°C, Package Quantity=1, Supplier Part Number 1=4234670, Tolerance=5%, Voltage Rating=50V, Case/Package=0603, Category="Ceramic Capacitors", ComponentLink1Description=https://datasheet.ciiva.com/144/mlccorderingcode-144635.pdf?src-supplier=Digi-Key, ComponentLink1URL=https://datasheet.ciiva.com/144/mlccorderingcode-144635.pdf?src-supplier=Digi-Key, ComponentLink2Description=https://datasheet.ciiva.com/144/mlccorderingcode-144636.pdf?src-supplier=Digi-Key, ComponentLink2URL=https://datasheet.ciiva.com/144/mlccorderingcode-144636.pdf?src-supplier=Digi-Key, ComponentLink3Description=https://datasheet.ciiva.com/8033/1443161-8033721.pdf?src-supplier=Element14, ComponentLink3URL=https://datasheet.ciiva.com/8033/1443161-8033721.pdf?src-supplier=Element14, ComponentLink4Description=https://datasheet.ciiva.com/28450/1443161-28450472.pdf?src-supplier=Element14, ComponentLink4URL=https://datasheet.ciiva.com/28450/1443161-28450472.pdf?src-supplier=Element14, ComponentLink5Description=https://datasheet.ciiva.com/144/mlccorderingcode-144634.pdf?src-supplier=Digi-Key, ComponentLink5URL=https://datasheet.ciiva.com/144/mlccorderingcode-144634.pdf?src-supplier=Digi-Key, ComponentLink6Description=https://datasheet.ciiva.com/8033/1734582-8033723.pdf?src-supplier=Element14, ComponentLink6URL=https://datasheet.ciiva.com/8033/1734582-8033723.pdf?src-supplier=Element14, ComponentLink7Description=https://datasheet.ciiva.com/8033/1734582-8033722.pdf?src-supplier=Element14, ComponentLink7URL=https://datasheet.ciiva.com/8033/1734582-8033722.pdf?src-supplier=Element14, ComponentLink8Description=https://datasheet.ciiva.com/11464/upy-gp-np0-16v-to-50v-8-11464727.pdf?src-supplier=Avnet, ComponentLink8URL=https://datasheet.ciiva.com/11464/upy-gp-np0-16v-to-50v-8-11464727.pdf?src-supplier=Avnet, Depth=0.8mm, Height=0.8mm, Item Type=Capacitor, Lead Free="Lead Free", Length=1.6mm, Manufacturer Part Number=CC0603JRNPO9BN150, Mounting Technology="Surface Mount", Packaging="Tape and Reel", Pins=2, Pricing 1="4000=0.0038, 16000=0.0036, 80000=0.0034, 160000=0.0033, 500000=0.0031 (USD)", Radiation Hardening=No, Reach SVHC Compliant=No, RoHS=Yes, RoHS Compliant=Yes, Series=CC, Stock 1=832000, Supplier 1="Future Electronics", Termination=SMD/SMT, Thickness=0.035inch, Width=0.031inch
C15 C20 C22 C24 C26 C42 C47 C49 C51 C53 C69 C74 C76 C78 C80 C82: library part GCJ188R71H104KA12D, "CAP CER 0.1UF 50V X7R 0603", Case Code (Imperial)=0603, Case Code (Metric)=1608, Dielectric=X7R, LCSC Part Number=C161115, Manufacturer=Murata, Max Operating Temperature=125°C, Min Operating Temperature=-55°C, Package Quantity=1, Ratings=AEC-Q200, Tolerance=10%, Voltage Rating=50V, Case/Package=0603, ComponentLink1Description=https://datasheet.ciiva.com/135/product-135604.pdf?src-supplier=Digikey, ComponentLink1URL=https://datasheet.ciiva.com/135/product-135604.pdf?src-supplier=Digikey, ComponentLink2Description=https://datasheet.ciiva.com/26889/getdatasheetpartid-369886-26889118.pdf?src-supplier=Verical, ComponentLink2URL=https://datasheet.ciiva.com/26889/getdatasheetpartid-369886-26889118.pdf?src-supplier=Verical, ComponentLink3Description=https://datasheet.ciiva.com/135/s0717e-135605.pdf?src-supplier=Digikey, ComponentLink3URL=https://datasheet.ciiva.com/135/s0717e-135605.pdf?src-supplier=Digikey, ComponentLink4Description=https://datasheet.ciiva.com/135/s0717e-135606.pdf?src-supplier=Digikey, ComponentLink4URL=https://datasheet.ciiva.com/135/s0717e-135606.pdf?src-supplier=Digikey, ComponentLink5Description=https://datasheet.ciiva.com/16440/c03e-16440425.pdf?src-supplier=Future+Electronics, ComponentLink5URL=https://datasheet.ciiva.com/16440/c03e-16440425.pdf?src-supplier=Future+Electronics, Construction=Flat, Depth=0.8mm, Features="Soft Termination", Height=0.8mm, Item Type=Capacitors, Lead Free=5697LeadFree, Length=1.6mm, Manufacturer Part Number=GCJ188R71H104KA12D, Material=4241ConductorMaterial, Mounting Technology="Surface Mount", Packaging="Tape and Reel", Pricing="1=0.13, 10=0.056, 50=0.056, 100=0.036, 1000=0.032, 10000=0.02 (USD)", Radiation Hardening=No, RoHS=Yes, RoHS Compliant=Yes, Series=GCJ, Stock=342536, Supplier=Mouser, Termination=SMD/SMT, Thickness=0.035inch, Voltage Rating (DC)=50V, Width=0.031inch
C21 C23 C25 C27 C48 C50 C52 C54 C75 C77 C79 C81 C83: library part GRM188Z71A475KE15D, "CAP CER 4.7UF 10V X7R 0603", Case/Package=0603, LCSC Part Number=C913474, Manufacturer=Murata, Max Operating Temperature=125°C, Min Operating Temperature=-55°C, Tolerance=10%, Voltage Rating=10V, ComponentLink1Description=https://datasheet.octopart.com/GRM188Z71A475KE15D-Murata-datasheet-149523299.pdf?src-supplier=Newark, ComponentLink1URL=https://datasheet.octopart.com/GRM188Z71A475KE15D-Murata-datasheet-149523299.pdf?src-supplier=Newark, ComponentLink2Description=https://datasheet.octopart.com/GRM188Z71A475KE15D-Murata-datasheet-165579666.pdf?src-supplier=TME, ComponentLink2URL=https://datasheet.octopart.com/GRM188Z71A475KE15D-Murata-datasheet-165579666.pdf?src-supplier=TME, Height=950um, Item Type=Capacitors, Length=1.6mm, Manufacturer Part Number=GRM188Z71A475KE15D, Material=4241ConductorMaterial, Pricing="1=0.24, 10=0.1, 50=0.1, 100=0.063, 1000=0.055, 10000=0.041 (USD)", RoHS=Yes, RoHS Compliant=Yes, Stock=33218, Supplier=Mouser, Thickness=800um, Width=800um
D1 D2 D3 D4 D5 D6 D9 D10 D11 D12 D13 D14 D17 D18 D19 D20 D21 D22: "DIODE ARR GP 100V 215MA TO-236AB", Breakdown Voltage=75V, Forward Current=125mA, Forward Voltage=1.25V, LCSC Part Number=C2500, Manufacturer=Nexperia, Max Forward Surge Current (Ifsm)=500mA, Max Operating Temperature=150°C, Max Repetitive Reverse Voltage (Vrrm)=100V, Max Reverse Current=500nA, ComponentLink1Description=http://www.farnell.com/datasheets/953882.pdf?src-supplier=Farnell, ComponentLink1URL=http://www.farnell.com/datasheets/953882.pdf?src-supplier=Farnell, ComponentLink2Description=http://www.farnell.com/datasheets/953882.pdf?src-supplier=Newark, ComponentLink2URL=http://www.farnell.com/datasheets/953882.pdf?src-supplier=Newark, ComponentLink3Description=https://datasheet.octopart.com/BAV99%2C215-Nexperia-datasheet-10109661.pdf?src-supplier=Element14, ComponentLink3URL=https://datasheet.octopart.com/BAV99%2C215-Nexperia-datasheet-10109661.pdf?src-supplier=Element14, ComponentLink4Description=https://assets.nexperia.com/documents/data-sheet/BAV99_SER.pdf?src-supplier=Digikey, ComponentLink4URL=https://assets.nexperia.com/documents/data-sheet/BAV99_SER.pdf?src-supplier=Digikey, ComponentLink5Description=https://datasheet.octopart.com/BAV99%2C215-Nexperia-datasheet-87580883.pdf?src-supplier=Newark, ComponentLink5URL=https://datasheet.octopart.com/BAV99%2C215-Nexperia-datasheet-87580883.pdf?src-supplier=Newark, Height=1.1mm, Item Type=Diodes, Manufacturer Part Number=BAV99,215, Pins=3NUMBER, Pricing="3000=0.008, 12000=0.0077, 30000=0.0075, 75000=0.0073, 120000=0.007 (USD)", Reverse Voltage=100V, RoHS=Yes, RoHS Compliant=Yes, Stock=20217000, Supplier="Future Electronics"
J1: "320V 20A 18 Bend -40℃~+105℃ 1 5.08mm 1x18P Green Receptacle-Close Screw Fixing Push-Pull,P=5.08mm Pluggable System Terminal Block ROHS", LCSC Part Number=C430542, Manufacturer=DORABO, Package=Push-Pull,P=5.08mm, ComponentLink1Description=LCSC, ComponentLink1URL=https://www.lcsc.com/product-detail/Pluggable-System-Terminal-Block_DORABO-DB2ERM-5-08-18P-GN_C430542.html?s_z=n_DB2ERM-5.08-18P-GN, Item Type="Terminal Block", Manufacturer Part Number=DB2ERM-5.08-18P-GN
J2: "CONN HDR 24POS 0.1 GOLD PCB R/A", Color=Black, Manufacturer=Sullins, Package Quantity=1000, ComponentLink1Description=http://sullinscorp.com/catalogs/147_PAGE119_.100_SFH11_SERIES_FEMALE_HDR_ST_RA.pdf?src-supplier=Digikey, ComponentLink1URL=http://sullinscorp.com/catalogs/147_PAGE119_.100_SFH11_SERIES_FEMALE_HDR_ST_RA.pdf?src-supplier=Digikey, Connector Type=Header, Contact Plating=Gold, Contact Type="Female Socket", Item Type=Connectors, Manufacturer Part Number=SFH11-PBPC-D12-RA-BK, Mounting Technology="Through Hole", Number of Positions=24, Number of Rows=2, Packaging=Tray, Pitch=0.1inch, Pricing="1000=0.8853 (USD)", RoHS=Yes, RoHS Compliant=Yes, Row Spacing=0.1inch, Series=SFH11, Supplier=Digikey, Termination=Solder
LED1 LED2 LED3 LED4 LED5 LED6 LED7 LED8 LED9 LED10 LED11 LED12: library part NCD0603G2, "Emerald 0603 Light Emitting Diodes (LED) ROHS", LCSC Part Number=C87326, Manufacturer="Foshan NationStar Optoelectronics", Package=0603, ComponentLink1Description=LCSC, ComponentLink1URL=https://www.lcsc.com/product-detail/Light-Emitting-Diodes-LED_Foshan-NationStar-Optoelectronics-NCD0603G2_C87326.html, Item Type=LED, Manufacturer Part Number=NCD0603G2
R1 R5 R7 R8 R9 R13 R15 R19 R25 R27 R34 R38 R40 R41 R42 R46 R48 R52 R58 R60 R67 R71 R73 R74 R75 R79 R81 R85 R91 R93: library part RC0603FR-070RL, "RES SMD 0R, 1%, 0.1W, 0603", LCSC Part Number=C100044, Manufacturer=Yageo, Package=0603, ComponentLink9Description=LCSC, ComponentLink9URL=https://www.lcsc.com/product-detail/Chip-Resistor-Surface-Mount_YAGEO-RC0603FR-070RL_C100044.html, Item Type=Resistor, Manufacturer Part Number=RC0603FR-070RL
R2 R6 R10 R14 R16 R20 R35 R39 R43 R47 R49 R53 R68 R72 R76 R80 R82 R86: library part RC0603FR-071KL, "RES SMD 1K OHM 1% 1/10W 0603", Case Code (Imperial)=0603, Case Code (Metric)=1608, LCSC Part Number=C22548, Manufacturer=Yageo, Max Operating Temperature=155°C, Min Operating Temperature=-55°C, Power Rating=100mW, Resistance=1kR, Supplier Part Number 1=311-1.00KHRDKR-ND, Temperature Coefficient=100ppm/°C, Tolerance=1%, Voltage Rating=50V, Case/Package=0603, ComponentLink1Description=https://www.verical.com/server-webapp/html/getDatasheet?partID=409289&src-supplier=Verical, ComponentLink1URL=https://www.verical.com/server-webapp/html/getDatasheet?partID=409289&src-supplier=Verical, ComponentLink2Description=http://documents.rs-components.com/techlib://itc_doclist_GB.htm?stockno=5048928&src-supplier=RSComponents, ComponentLink2URL=http://documents.rs-components.com/techlib://itc_doclist_GB.htm?stockno=5048928&src-supplier=RSComponents, ComponentLink3Description=http://www.yageo.com/documents/recent/PYu-RC0603_51_RoHS_L_4.pdf?src-supplier=Avnet+Europe, ComponentLink3URL=http://www.yageo.com/documents/recent/PYu-RC0603_51_RoHS_L_4.pdf?src-supplier=Avnet+Europe, ComponentLink4Description=http://www.farnell.com/datasheets/2167052.pdf?src-supplier=Element14, ComponentLink4URL=http://www.farnell.com/datasheets/2167052.pdf?src-supplier=Element14, ComponentLink5Description=http://www.farnell.com/datasheets/1868787.pdf?src-supplier=Element14, ComponentLink5URL=http://www.farnell.com/datasheets/1868787.pdf?src-supplier=Element14, ComponentLink6Description=http://www.yageo.com/documents/recent/PYu-RC_Group_51_RoHS_L_2.pdf?src-supplier=Avnet, ComponentLink6URL=http://www.yageo.com/documents/recent/PYu-RC_Group_51_RoHS_L_2.pdf?src-supplier=Avnet, ComponentLink7Description=https://www.verical.com/server-webapp/html/getDatasheet?partID=404327&src-supplier=Verical, ComponentLink7URL=https://www.verical.com/server-webapp/html/getDatasheet?partID=404327&src-supplier=Verical, ComponentLink8Description=http://www.farnell.com/datasheets/443971.pdf?src-supplier=Element14, ComponentLink8URL=http://www.farnell.com/datasheets/443971.pdf?src-supplier=Element14, Composition="Thick Film", Contact Plating=Tin,Matte, Depth=0.8mm, Height=0.45mm, Item Type=Resistor, Lead Free="Lead Free", Length=1.6mm, Manufacturer Part Number=RC0603FR-071KL, Military Standard=Not, Packaging="Tape and Reel", Pricing 1="1=0.1, 10=0.023, 100=0.0094, 1000=0.0042, 2500=0.0037 (USD)", Radiation Hardening=No, REACH SVHC="No SVHC", Stock 1=21472395, Supplier 1=Digi-Key, Termination=SMD/SMT
R3 R4 R11 R12 R17 R18 R36 R37 R44 R45 R50 R51 R69 R70 R77 R78 R83 R84: library part PA2512FKE7T0R002E, "RES 0.002 OHM 1% 3W 2512", LCSC Part Number=C375692, Manufacturer=Yageo, Item Type=Resistors, Manufacturer Part Number=PA2512FKE7T0R002E, Pricing="1=0.87, 10=0.754, 25=0.662, 50=0.5936, 100=0.5253, 250=0.45696, 500=0.37944, 1000=0.31212 (USD)", RoHS=Yes, Stock=3531, Supplier=Digikey
R21 R54 R87: library part RC0603FR-0710KL, "RES SMD 10K Ohm 1% 1/10W 0603", Case Code (Imperial)=0603, Case Code (Metric)=1608, LCSC Part Number=C98220, Manufacturer=Yageo, Max Operating Temperature=155°C, Max Power Dissipation=100mW, Min Operating Temperature=-55°C, Resistance=10kR, Resistance Tolerance=1%, Resistor Type="Thick Film", Supplier Part Number 1=311-10.0KHRCT-ND, Temperature Coefficient=100ppm/°C, Voltage Rating=75V, Voltage Rating (DC)=50V, Case/Package=0603, Category="Chip SMD Resistors", ComponentLink1Description=https://datasheet.ciiva.com/7660/38590-7660789.pdf?src-supplier=Element14, ComponentLink1URL=https://datasheet.ciiva.com/7660/38590-7660789.pdf?src-supplier=Element14, ComponentLink2Description=https://datasheet.ciiva.com/7983/443971-7983596.pdf?src-supplier=Element14, ComponentLink2URL=https://datasheet.ciiva.com/7983/443971-7983596.pdf?src-supplier=Element14, ComponentLink3Description=https://datasheet.ciiva.com/22747/443971-22747519.pdf?src-supplier=Element14, ComponentLink3URL=https://datasheet.ciiva.com/22747/443971-22747519.pdf?src-supplier=Element14, ComponentLink4Description=https://datasheet.ciiva.com/46440/1868787-46440891.pdf?src-supplier=Element14, ComponentLink4URL=https://datasheet.ciiva.com/46440/1868787-46440891.pdf?src-supplier=Element14, ComponentLink5Description=https://datasheet.ciiva.com/7746/1738695-7746239.pdf?src-supplier=Element14, ComponentLink5URL=https://datasheet.ciiva.com/7746/1738695-7746239.pdf?src-supplier=Element14, ComponentLink6Description=https://datasheet.ciiva.com/15189/getdatasheetpartid-409289-15189591.pdf?src-supplier=Verical, ComponentLink6URL=https://datasheet.ciiva.com/15189/getdatasheetpartid-409289-15189591.pdf?src-supplier=Verical, Construction=Rectangular, Depth=0.8mm, Features="Moisture Resistant", Height=0.45mm, Item Type=Resistor, Lead Free="Lead Free", Lead Pitch=0.3mm, Length=1.6mm, Manufacturer Part Number=RC0603FR-0710KL, Military Standard=Not, Number of Pins=2, Number of Terminations=2, Packaging="Tape and Reel", Power Rating=100mW, Pricing 1="1=0.10000, 10=0.02400, 100=0.00970, 1000=0.00436, 2500=0.00378 (USD)", REACH SVHC=Unknown, RoHS=Yes, RoHS Compliant=Yes, Series=RC, Size Code=0603, Stock 1=25249139, Supplier 1=Digi-Key, Termination=SMD/SMT, Tolerance=1%, Weight=7.1E-05oz, Width=0.8mm
R30 R31 R32 R33 R63 R64 R65 R66 R96 R97 R98 R99: library part RC0603FR-07680RL, "RES SMD 680 OHM 1% 1/10W 0603", LCSC Part Number=C112310, Manufacturer=Yageo, Package=0603, ComponentLink4Description=LCSC, ComponentLink4URL=https://www.lcsc.com/product-detail/Chip-Resistor-Surface-Mount_YAGEO-RC0603FR-07680RL_C112310.html, Item Type=Resistor, Manufacturer Part Number=RC0603FR-07680RL
SB1 SB2 SB3: "Solder Bridge ON", Manufacturer Part Number="Solder Bridge", Item Type="Solder Bridge"
U1 U2 U3: "IC AFE 7 CHAN 40LFCSP-WQ", Manufacturer="Analog Devices", Supplier Part Number=584-ADE9000ACPZ, ComponentLink1Description=http://www.farnell.com/datasheets/2280571.pdf?src-supplier=Farnell, ComponentLink1URL=http://www.farnell.com/datasheets/2280571.pdf?src-supplier=Farnell, ComponentLink2Description=https://datasheet.octopart.com/ADE9000ACPZ-Analog-Devices-datasheet-165826959.pdf?src-supplier=Element14, ComponentLink2URL=https://datasheet.octopart.com/ADE9000ACPZ-Analog-Devices-datasheet-165826959.pdf?src-supplier=Element14, ComponentLink3Description=https://www.analog.com/media/en/technical-documentation/data-sheets/ADE9000.pdf?src-supplier=Digikey, ComponentLink3URL=https://www.analog.com/media/en/technical-documentation/data-sheets/ADE9000.pdf?src-supplier=Digikey, Item Type=IC, Manufacturer Part Number=ADE9000ACPZ, Pricing="1=18.44, 10=13.35, 50=10.79, 100=10.79, 1000=10.52, 10000=10.52 (USD)", RoHS=Yes, Stock=7889, Supplier=Mouser
X1 X2 X3: library part X322524576MOB4SI, "24.576MHz Surface Mount Crystal 12pF ±10ppm ±20ppm SMD3225-4P Crystals ROHS", LCSC Part Number=C70568, Manufacturer=YXC, ComponentLink1Description=LCSC, ComponentLink1URL=https://www.lcsc.com/product-detail/Crystals_YXC-Crystal-Oscillators-X322524576MOB4SI_C70568.html?s_z=n_X322524576MOB4SI, Item Type=Crystal, Manufacturer Part Number=X322524576MOB4SI, RoHS=No, Supplier=LCSC

## Free pads (board coordinates)
  round 177.17 hole 137.8: MH2(196.85,196.85) MH2(4133.86,196.85)

## Via types
v1: diameter 23.62, hole 11.81, Top Layer to Bottom Layer, tented both sides, 272 vias
v2: diameter 47.24, hole 27.56, Top Layer to Bottom Layer, tented both sides, 108 vias

## Nets (pads, with @x,y where several pads share a name; then routed paths per layer and width w, separated by ;. In a path a pad name is that pad's centre, name@x,y a point inside that pad or via, vN(x,y) a via of type N, cw(c..) or ccw(c..) an arc to the next point about the centre after c; other vN are vias at no path point)
+3V3: C26.2 C27.2 C53.2 C54.2 C80.2 C81.2 C82.2 C83.2 J2.9 J2.10 R21.1 R32.2 R33.2 R54.1 R65.2 R66.2 R87.1 R98.2 R99.2 U1.1 U1.27 U2.1 U2.27 U3.1 U3.27 | length 9383
  Top Layer w10: v1(862.2,1704.72) 876.77,1719.29 U1.1@876.77,1754.13 ; v1(911.24,2290.78) 911.24,2166.99 928.94,2149.29 931.73,2149.29 C26.2@941.73,2139.29 ; U1.27@935.83,1986.02 935.83,2133.39 cw(c941.73,2133.39) C26.2@941.73,2139.29 ; v1(2062.2,1704.72) 2076.77,1719.29 U2.1@2076.77,1754.13 ; v1(2111.24,2290.78) 2111.24,2166.99 2128.94,2149.29 2131.73,2149.29 C53.2@2141.73,2139.29 ; U2.27@2135.83,1986.02 2135.83,2133.39 cw(c2141.73,2133.39) C53.2@2141.73,2139.29 ; v1(3262.2,1704.72) 3276.77,1719.29 U3.1@3276.77,1754.13 ; v1(3311.24,2290.78) 3311.24,2166.99 3328.94,2149.29 3331.73,2149.29 C80.2@3341.73,2139.29 ; U3.27@3335.83,1986.02 3335.83,2133.39 cw(c3341.73,2133.39) C80.2@3341.73,2139.29
  Top Layer w15: v1(581.48,1668.54) 601.03,1668.54 640.02,1629.55 R21.1@642.52,1629.55 ; C26.2@941.73,2139.29 C27.2@992.91,2139.29 ; v1(1781.48,1668.54) 1801.03,1668.54 1840.02,1629.55 R54.1@1842.52,1629.55 ; C53.2@2141.73,2139.29 C54.2@2192.91,2139.29 ; v1(2981.48,1668.54) 3001.03,1668.54 3040.02,1629.55 R87.1@3042.52,1629.55 ; C80.2@3341.73,2139.29 C81.2@3392.91,2139.29
  Top Layer w20: R33.2@463.6,1995 425.18,1995 407,1976.82 407,1711.9 450.35,1668.54 v1(581.48,1668.54) ; R33.2@463.6,2000 R32.2@463.6,2051.18 R32.2@463.6,2058.68 ; R66.2@1663.6,1995 1625.18,1995 1607,1976.82 1607,1711.9 1650.35,1668.54 v1(1781.48,1668.54) ; R66.2@1663.6,2000 R65.2@1663.6,2051.18 R65.2@1663.6,2058.68 ; R99.2@2863.6,1995 2825.18,1995 2807,1976.82 2807,1711.9 2850.35,1668.54 v1(2981.48,1668.54) ; R99.2@2863.6,2000 R98.2@2863.6,2051.18 R98.2@2863.6,2058.68
  Top Layer w25: C82.2@2395.2,2165.35 C83.2@2395.2,2220.47
  Top Layer w30: J2.9@2315.35,2490.95 J2.10@2315.35,2390.95 2315.35,2301.32 C83.2@2395.2,2221.47
  Layer 2 w40: v1(581.48,1668.54) ccw(c652.19,1739.25) 652.19,1639.25 796.73,1639.25 ccw(c796.73,1704.72) v1(862.2,1704.72) 862.2,2235.85 cw(c917.14,2235.85) 917.14,2290.78 1985.22,2290.78 ; v1(1781.48,1668.54) ccw(c1852.19,1739.25) 1852.19,1639.25 1996.73,1639.25 ccw(c1996.73,1704.72) v1(2062.2,1704.72) 2062.2,2213.62 ; 1985.04,2290.78 cw(c1985.04,2213.62) 1985.22,2290.78 ; 2139.37,2290.78 ccw(c2139.37,2213.62) 2139.19,2290.78 ; 2382.98,2290.78 cw(c2383.1,2358.56) J2.10@2315.35,2356.76 ; v1(2981.48,1668.54) 2982.32,1667.7 ccw(c3053.03,1738.41) 3053.03,1638.41 3195.89,1638.41 ccw(c3195.89,1704.72) v1(3262.2,1704.72) 3262.2,2213.79 ; 3185.04,2290.78 cw(c3185.04,2213.62) 3185.22,2290.78 ; 3262.21,2213.62 ccw(c3185.04,2213.62) 3262.2,2213.79 ; v1@3318.14,2290.78 v1(3311.24,2290.78) 3185.22,2290.78 ; v1@3320.02,2290.79 ccw(c3320.02,2232.97) 3262.2,2232.97 3262.2,2213.79 ; 1985.22,2290.78 cw(c1985.04,2213.62) 2062.2,2213.79 ; 1985.22,2290.78 2139.19,2290.78 ; 2062.21,2213.62 ccw(c1985.04,2213.62) 2062.2,2213.79 ; 2062.2,2213.62 cw(c2139.37,2213.62) 2062.2,2213.79 ; 2062.2,2213.79 cw(c2139.37,2213.62) 2139.19,2290.78 ; 2139.19,2290.78 2247.49,2290.78 ; 2247.49,2290.78 ccw(c2247.61,2358.56) 2247.72,2290.78 ; 2247.49,2290.78 2247.72,2290.78 ; 2247.72,2290.78 ccw(c2247.61,2358.56) J2.10@2315.35,2356.76 ; 2247.72,2290.78 3185.22,2290.78 ; J2.10@2315.35,2356.76 ccw(c2247.61,2358.56) 2315.38,2358.69 J2.10@2315.35,2390.95 2315.33,2358.69 ccw(c2383.1,2358.56) J2.10@2315.35,2356.76 ; 3185.22,2290.78 cw(c3185.04,2213.62) 3262.2,2213.79
AVDD1: C22.2 C23.2 U1.25 | length 233.5
  Top Layer w10: U1.25@975.2,1986.02 975.2,2041.2 1043.19,2109.19 C22.2@1043.19,2139.29
  Top Layer w15: C22.2@1043.19,2139.29 C23.2@1095.28,2139.29
AVDD2: C49.2 C50.2 U2.25 | length 233.5
  Top Layer w10: U2.25@2175.2,1986.02 2175.2,2041.2 2243.19,2109.19 C49.2@2243.19,2139.29
  Top Layer w15: C49.2@2243.19,2139.29 C50.2@2295.28,2139.29
AVDD3: C76.2 C77.2 U3.25 | length 233.5
  Top Layer w10: U3.25@3375.2,1986.02 3375.2,2041.2 3443.19,2109.19 C76.2@3443.19,2139.29
  Top Layer w15: C76.2@3443.19,2139.29 C77.2@3495.28,2139.29
CF3_1: R30.2 U1.35 | length 230.4
  Top Layer w10: R30.2@643.82,1939.88 707.51,1939.88 767.47,1879.92 U1.35@849.41,1879.92
CF3_2: R63.2 U2.35 | length 230.4
  Top Layer w10: R63.2@1843.82,1939.88 1907.51,1939.88 1967.47,1879.92 U2.35@2049.41,1879.92
CF3_3: R96.2 U3.35 | length 230.4
  Top Layer w10: R96.2@3043.82,1939.88 3107.51,1939.88 3167.47,1879.92 U3.35@3249.41,1879.92
CF4_1: R31.2 U1.36 | length 213.4
  Top Layer w10: R31.2@645.71,1883.7 726.59,1883.7 750.06,1860.24 U1.36@849.41,1860.24
CF4_2: R64.2 U2.36 | length 213.4
  Top Layer w10: R64.2@1845.71,1883.7 1926.59,1883.7 1950.06,1860.24 U2.36@2049.41,1860.24
CF4_3: R97.2 U3.36 | length 213.4
  Top Layer w10: R97.2@3045.71,1883.7 3126.59,1883.7 3150.06,1860.24 U3.36@3249.41,1860.24
DVDD1: C20.2 C21.2 U1.3 | length 333.6
  Top Layer w10: C20.2@700.08,1673.23 882.3,1673.23 ccw(c882.3,1707.07) 916.14,1707.07 U1.3@916.14,1754.13
  Top Layer w15: C20.2@705.08,1683.23 C21.2@705.08,1734.41
DVDD2: C47.2 C48.2 U2.3 | length 333.6
  Top Layer w10: C47.2@1900.08,1673.23 2082.3,1673.23 ccw(c2082.3,1707.07) 2116.14,1707.07 U2.3@2116.14,1754.13
  Top Layer w15: C47.2@1905.08,1683.23 C48.2@1905.08,1734.41
DVDD3: C74.2 C75.2 U3.3 | length 333.6
  Top Layer w10: C74.2@3100.08,1673.23 3282.3,1673.23 ccw(c3282.3,1707.07) 3316.14,1707.07 U3.3@3316.14,1754.13
  Top Layer w15: C74.2@3105.08,1683.23 C75.2@3105.08,1734.41
IA_N1: D2.1 D2.2 J1.2 R4.1 R5.1 | length 857.2
  Top Layer w20: D2.1@595.08,928.15 ccw(c606.89,928.15) 606.89,916.34
  Top Layer w30: D2.1@595.08,928.15 R5.1@595.08,1235.84
  Top Layer w40: 606.89,839.57 606.89,915.55
  Top Layer w60: v2(665.35,590.55) R4.1@665.35,651.77
  Bottom Layer w60: J1.2@665.35,196.85 v2(665.35,590.55)
IA_N2: D10.1 D10.2 J1.8 R37.1 R38.1 | length 857.2
  Top Layer w20: D10.1@1795.08,928.15 ccw(c1806.89,928.15) 1806.89,916.34
  Top Layer w30: D10.1@1795.08,928.15 R38.1@1795.08,1235.84
  Top Layer w40: 1806.89,839.57 1806.89,915.55
  Top Layer w60: v2(1865.35,590.55) R37.1@1865.35,651.77
  Bottom Layer w60: J1.8@1865.35,196.85 v2(1865.35,590.55)
IA_N3: D18.1 D18.2 J1.14 R70.1 R71.1 | length 857.2
  Top Layer w20: D18.1@2995.08,928.15 ccw(c3006.89,928.15) 3006.89,916.34
  Top Layer w30: D18.1@2995.08,928.15 R71.1@2995.08,1235.84
  Top Layer w40: 3006.89,839.57 3006.89,915.55
  Top Layer w60: v2(3065.35,590.55) R70.1@3065.35,651.77
  Bottom Layer w60: J1.14@3065.35,196.85 v2(3065.35,590.55)
IA_P1: D1.1 D1.2 J1.1 R1.1 R3.2 | length 857.2
  Top Layer w20: 523.82,916.34 ccw(c523.82,928.15) D1.2@535.63,928.15
  Top Layer w30: D1.2@535.63,928.15 R1.1@535.63,1235.84
  Top Layer w40: 523.82,840.35 523.82,916.34
  Top Layer w60: v2(465.35,590.55) R3.2@465.35,651.77
  Bottom Layer w60: J1.1@465.35,196.85 v2(465.35,590.55)
IA_P2: D9.1 D9.2 J1.7 R34.1 R36.2 | length 857.2
  Top Layer w20: 1723.82,916.34 ccw(c1723.82,928.15) D9.2@1735.63,928.15
  Top Layer w30: D9.2@1735.63,928.15 R34.1@1735.63,1235.84
  Top Layer w40: 1723.82,840.35 1723.82,916.34
  Top Layer w60: v2(1665.35,590.55) R36.2@1665.35,651.77
  Bottom Layer w60: J1.7@1665.35,196.85 v2(1665.35,590.55)
IA_P3: D17.1 D17.2 J1.13 R67.1 R69.2 | length 857.2
  Top Layer w20: 2923.82,916.34 ccw(c2923.82,928.15) D17.2@2935.63,928.15
  Top Layer w30: D17.2@2935.63,928.15 R67.1@2935.63,1235.84
  Top Layer w40: 2923.82,840.35 2923.82,916.34
  Top Layer w60: v2(2865.35,590.55) R69.2@2865.35,651.77
  Bottom Layer w60: J1.13@2865.35,196.85 v2(2865.35,590.55)
IAN1: C4.1 R6.2 U1.8 | length 775.3
  Top Layer w10: R6.2@595.08,1413.39 595.08,1473.03 cw(c629.92,1473.03) 629.92,1507.87 883.67,1507.87 ccw(c883.67,1638.77) 1014.57,1638.77 U1.8@1014.57,1754.13
  Top Layer w15: R6.2@595.08,1409.51 605.08,1402.01 638.92,1368.01 C4.1@661.42,1355.51
IAN2: C31.1 R39.2 U2.8 | length 775.3
  Top Layer w10: R39.2@1795.08,1413.39 1795.08,1473.03 cw(c1829.92,1473.03) 1829.92,1507.87 2083.67,1507.87 ccw(c2083.67,1638.77) 2214.57,1638.77 U2.8@2214.57,1754.13
  Top Layer w15: R39.2@1795.08,1409.51 1805.08,1402.01 1838.92,1368.01 C31.1@1861.42,1355.51
IAN3: C58.1 R72.2 U3.8 | length 775.3
  Top Layer w10: R72.2@2995.08,1413.39 2995.08,1473.03 cw(c3029.92,1473.03) 3029.92,1507.87 3283.67,1507.87 ccw(c3283.67,1638.77) 3414.57,1638.77 U3.8@3414.57,1754.13
  Top Layer w15: R72.2@2995.08,1409.51 3005.08,1402.01 3038.92,1368.01 C58.1@3061.42,1355.51
IAP1: C2.2 R2.2 U1.7 | length 824.8
  Top Layer w10: R2.2@535.63,1413.39 535.63,1497.25 cw(c571.45,1497.25) 571.45,1533.07 888.58,1533.07 ccw(c888.58,1639.37) 994.88,1639.37 U1.7@994.88,1754.13
  Top Layer w15: C2.2@469.29,1355.51 491.79,1366.43 527.2,1402.01 R2.2@534.67,1409.51
IAP2: C29.2 R35.2 U2.7 | length 824.8
  Top Layer w10: R35.2@1735.63,1413.39 1735.63,1497.25 cw(c1771.45,1497.25) 1771.45,1533.07 2088.58,1533.07 ccw(c2088.58,1639.37) 2194.88,1639.37 U2.7@2194.88,1754.13
  Top Layer w15: C29.2@1669.29,1355.51 1691.79,1366.43 1727.2,1402.01 R35.2@1734.67,1409.51
IAP3: C56.2 R68.2 U3.7 | length 824.8
  Top Layer w10: R68.2@2935.63,1413.39 2935.63,1497.25 cw(c2971.45,1497.25) 2971.45,1533.07 3288.58,1533.07 ccw(c3288.58,1639.37) 3394.88,1639.37 U3.7@3394.88,1754.13
  Top Layer w15: C56.2@2869.29,1355.51 2891.79,1366.43 2927.2,1402.01 R68.2@2934.67,1409.51
IB_N1: D4.1 D4.2 J1.4 R12.1 R13.1 | length 839.1
  Top Layer w20: 995.08,952.82 1001.73,946.17 1001.73,941.1 1007.87,934.96 D4.1@1009.84,934.96
  Top Layer w30: 995.08,952.82 R13.1@995.08,1235.84
  Top Layer w40: 1006.89,839.57 1006.89,915.55
  Top Layer w60: v2(1065.35,590.55) R12.1@1065.35,651.77
  Bottom Layer w60: J1.4@1065.35,196.85 v2(1065.35,590.55)
IB_N2: D12.1 D12.2 J1.10 R45.1 R46.1 | length 857.2
  Top Layer w20: D12.1@2195.08,928.15 ccw(c2206.89,928.15) 2206.89,916.34
  Top Layer w30: D12.1@2195.08,928.15 R46.1@2195.08,1235.84
  Top Layer w40: 2206.89,839.57 2206.89,915.55
  Top Layer w60: v2(2265.35,590.55) R45.1@2265.35,651.77
  Bottom Layer w60: J1.10@2265.35,196.85 v2(2265.35,590.55)
IB_N3: D20.1 D20.2 J1.16 R78.1 R79.1 | length 857.2
  Top Layer w20: D20.1@3395.08,928.15 ccw(c3406.89,928.15) 3406.89,916.34
  Top Layer w30: D20.1@3395.08,928.15 R79.1@3395.08,1235.84
  Top Layer w40: 3406.89,839.57 3406.89,915.55
  Top Layer w60: v2(3465.35,590.55) R78.1@3465.35,651.77
  Bottom Layer w60: J1.16@3465.35,196.85 v2(3465.35,590.55)
IB_P1: D3.1 D3.2 J1.3 R9.1 R11.2 | length 860.8
  Top Layer w20: D3.2@920.87,934.96 922.83,934.96 928.98,941.1 928.98,946.17 935.63,952.82 ; 923.82,916.34 ccw(c923.82,928.15) D3.2@935.63,928.15
  Top Layer w30: 935.63,952.82 R9.1@935.63,1235.84
  Top Layer w40: 923.82,916.34 923.82,840.35 926.1,838.07
  Top Layer w60: v2(865.35,590.55) R11.2@865.35,651.77
  Bottom Layer w60: J1.3@865.35,196.85 v2(865.35,590.55)
IB_P2: D11.1 D11.2 J1.9 R42.1 R44.2 | length 857.2
  Top Layer w20: 2123.82,916.34 ccw(c2123.82,928.15) D11.2@2135.63,928.15
  Top Layer w30: D11.2@2135.63,928.15 R42.1@2135.63,1235.84
  Top Layer w40: 2123.82,840.35 2123.82,916.34
  Top Layer w60: v2(2065.35,590.55) R44.2@2065.35,651.77
  Bottom Layer w60: J1.9@2065.35,196.85 v2(2065.35,590.55)